# Altium PCB PCB.PcbDoc (part 1 of 7)
Units mm, origin at the board's own origin, x right, y up, seen from the top; angles counter-clockwise.
Board outline 78.8 x 69 mm, 12 copper layers (Top Layer, GND_12, uStrip1, GND_35, Clocks, GND_57, POWER, Slow_Ctrl, GND_810, uStrip2, GND_1012, Bottom Layer), stack 2.926 mm thick; 290 components, 212 nets, 1379 pads, 3418 vias.
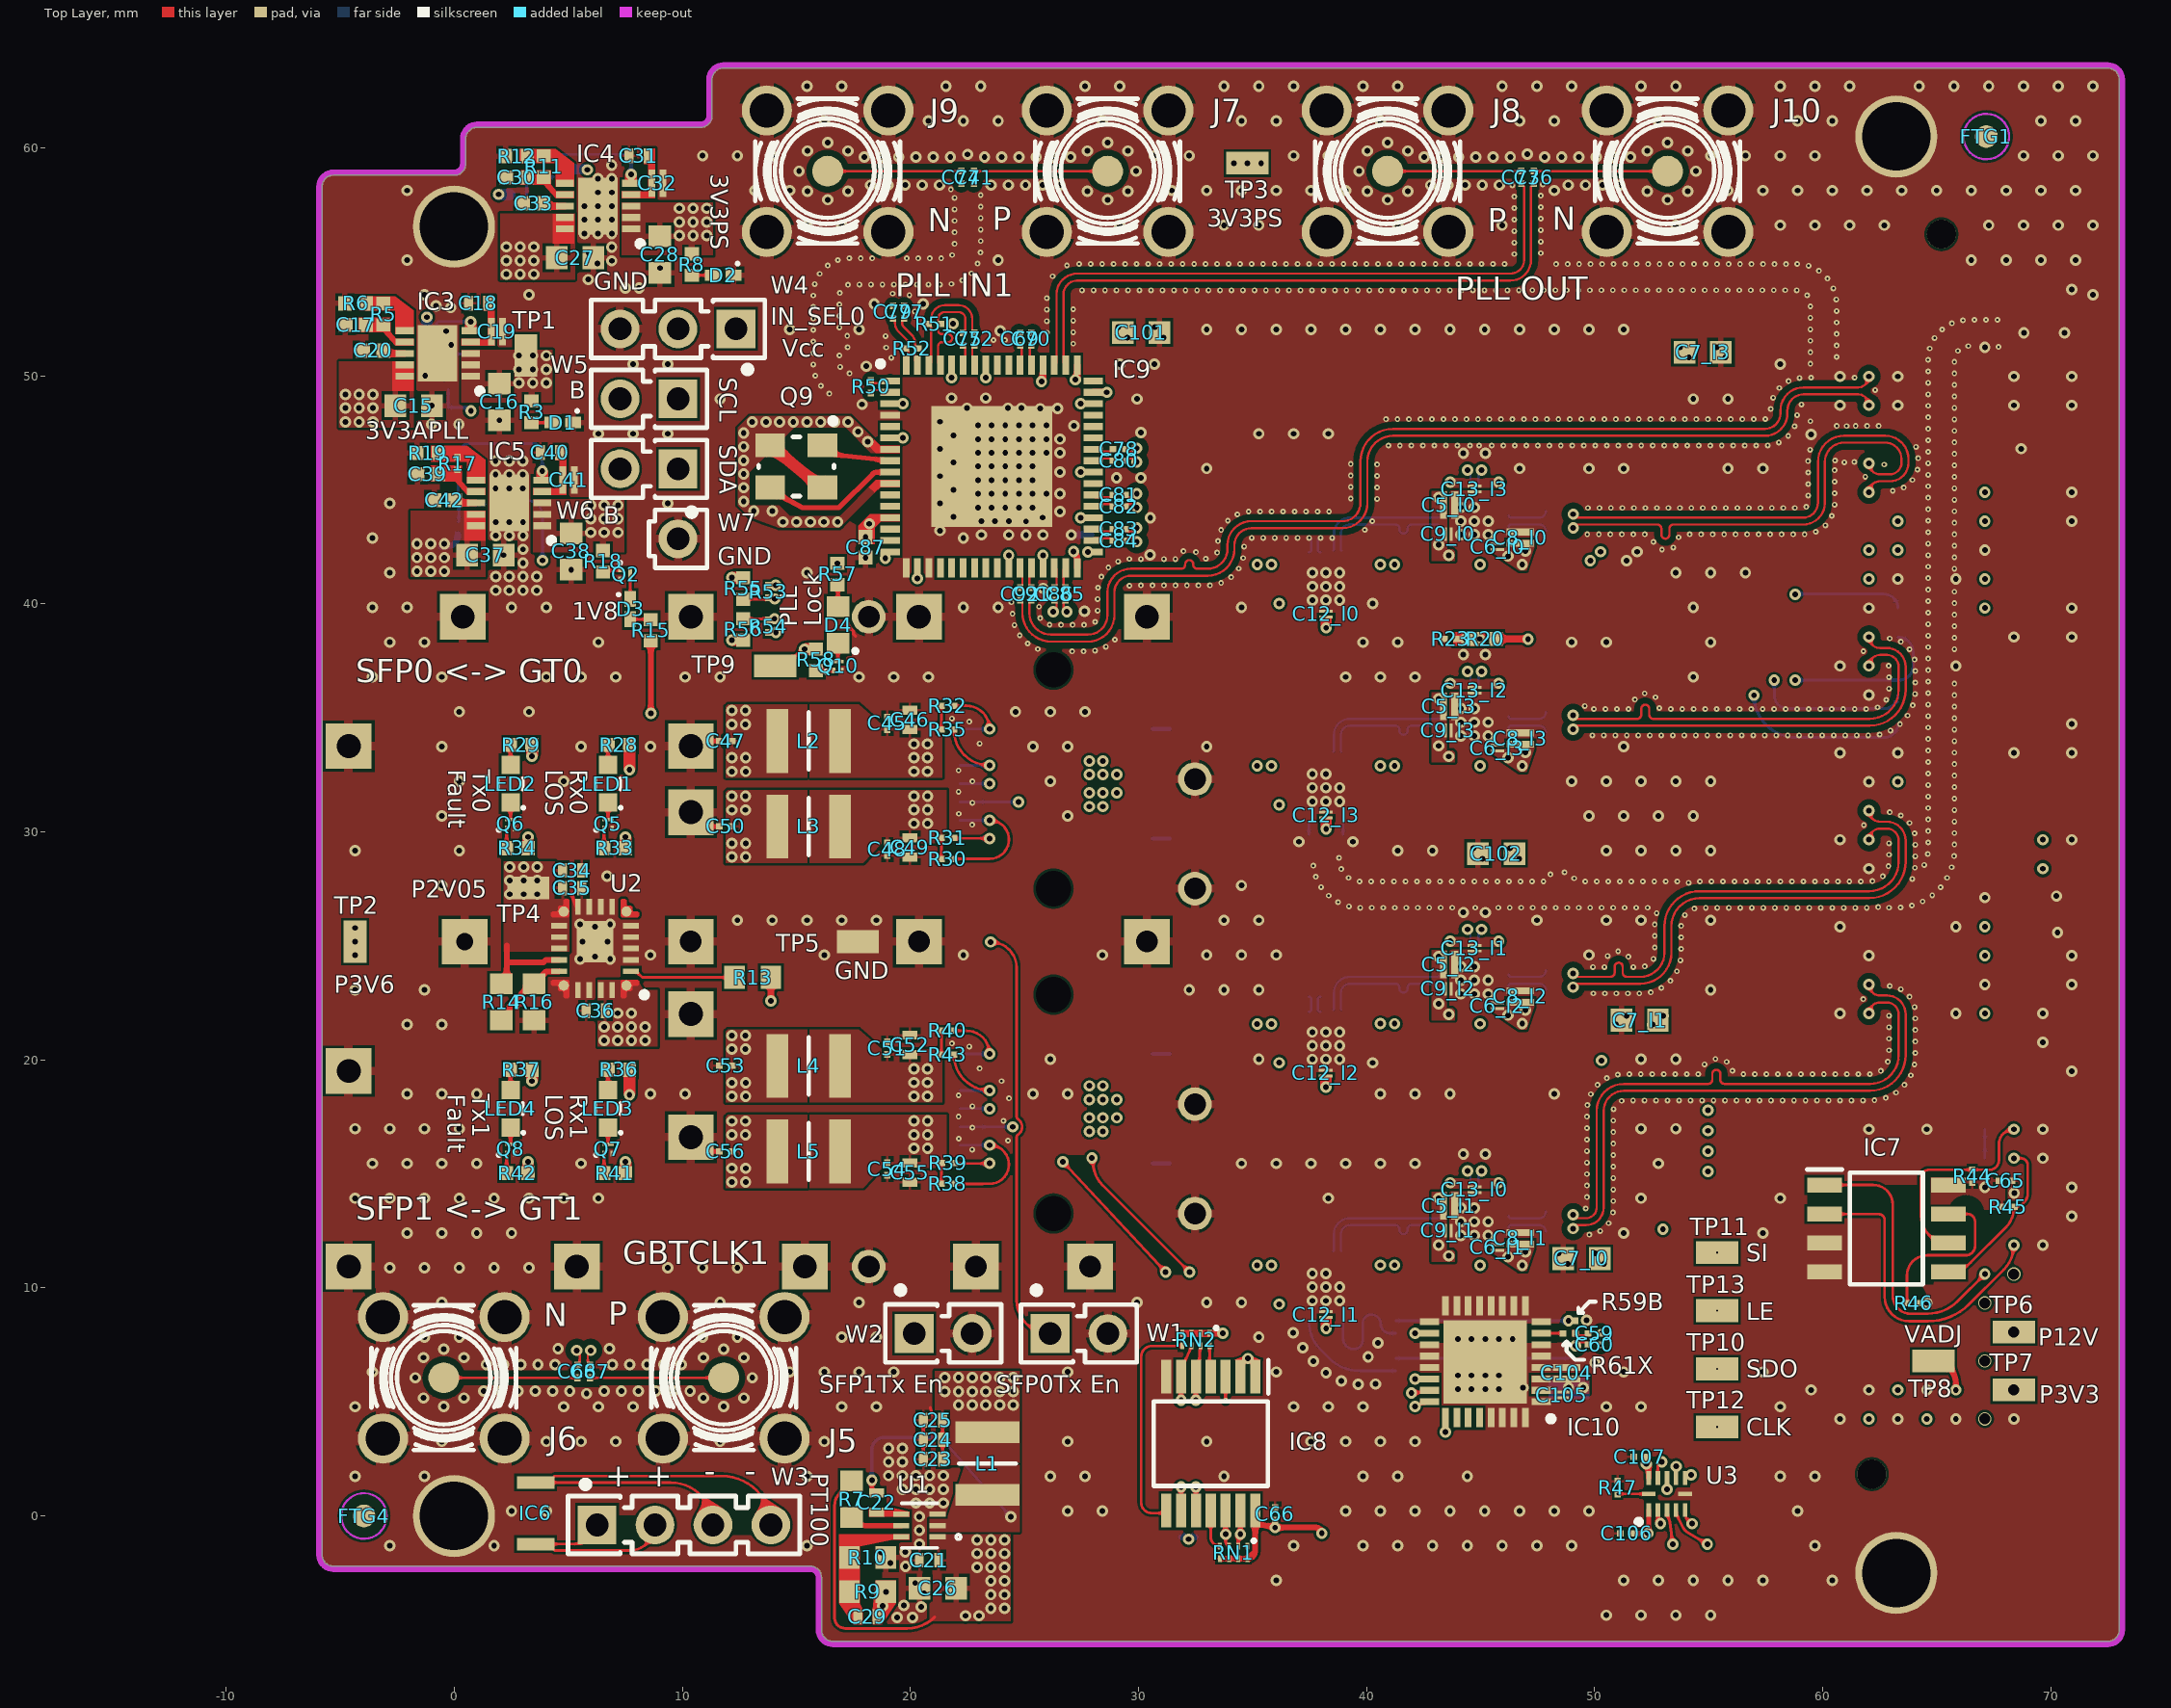
[diagram p0: Top Layer view]
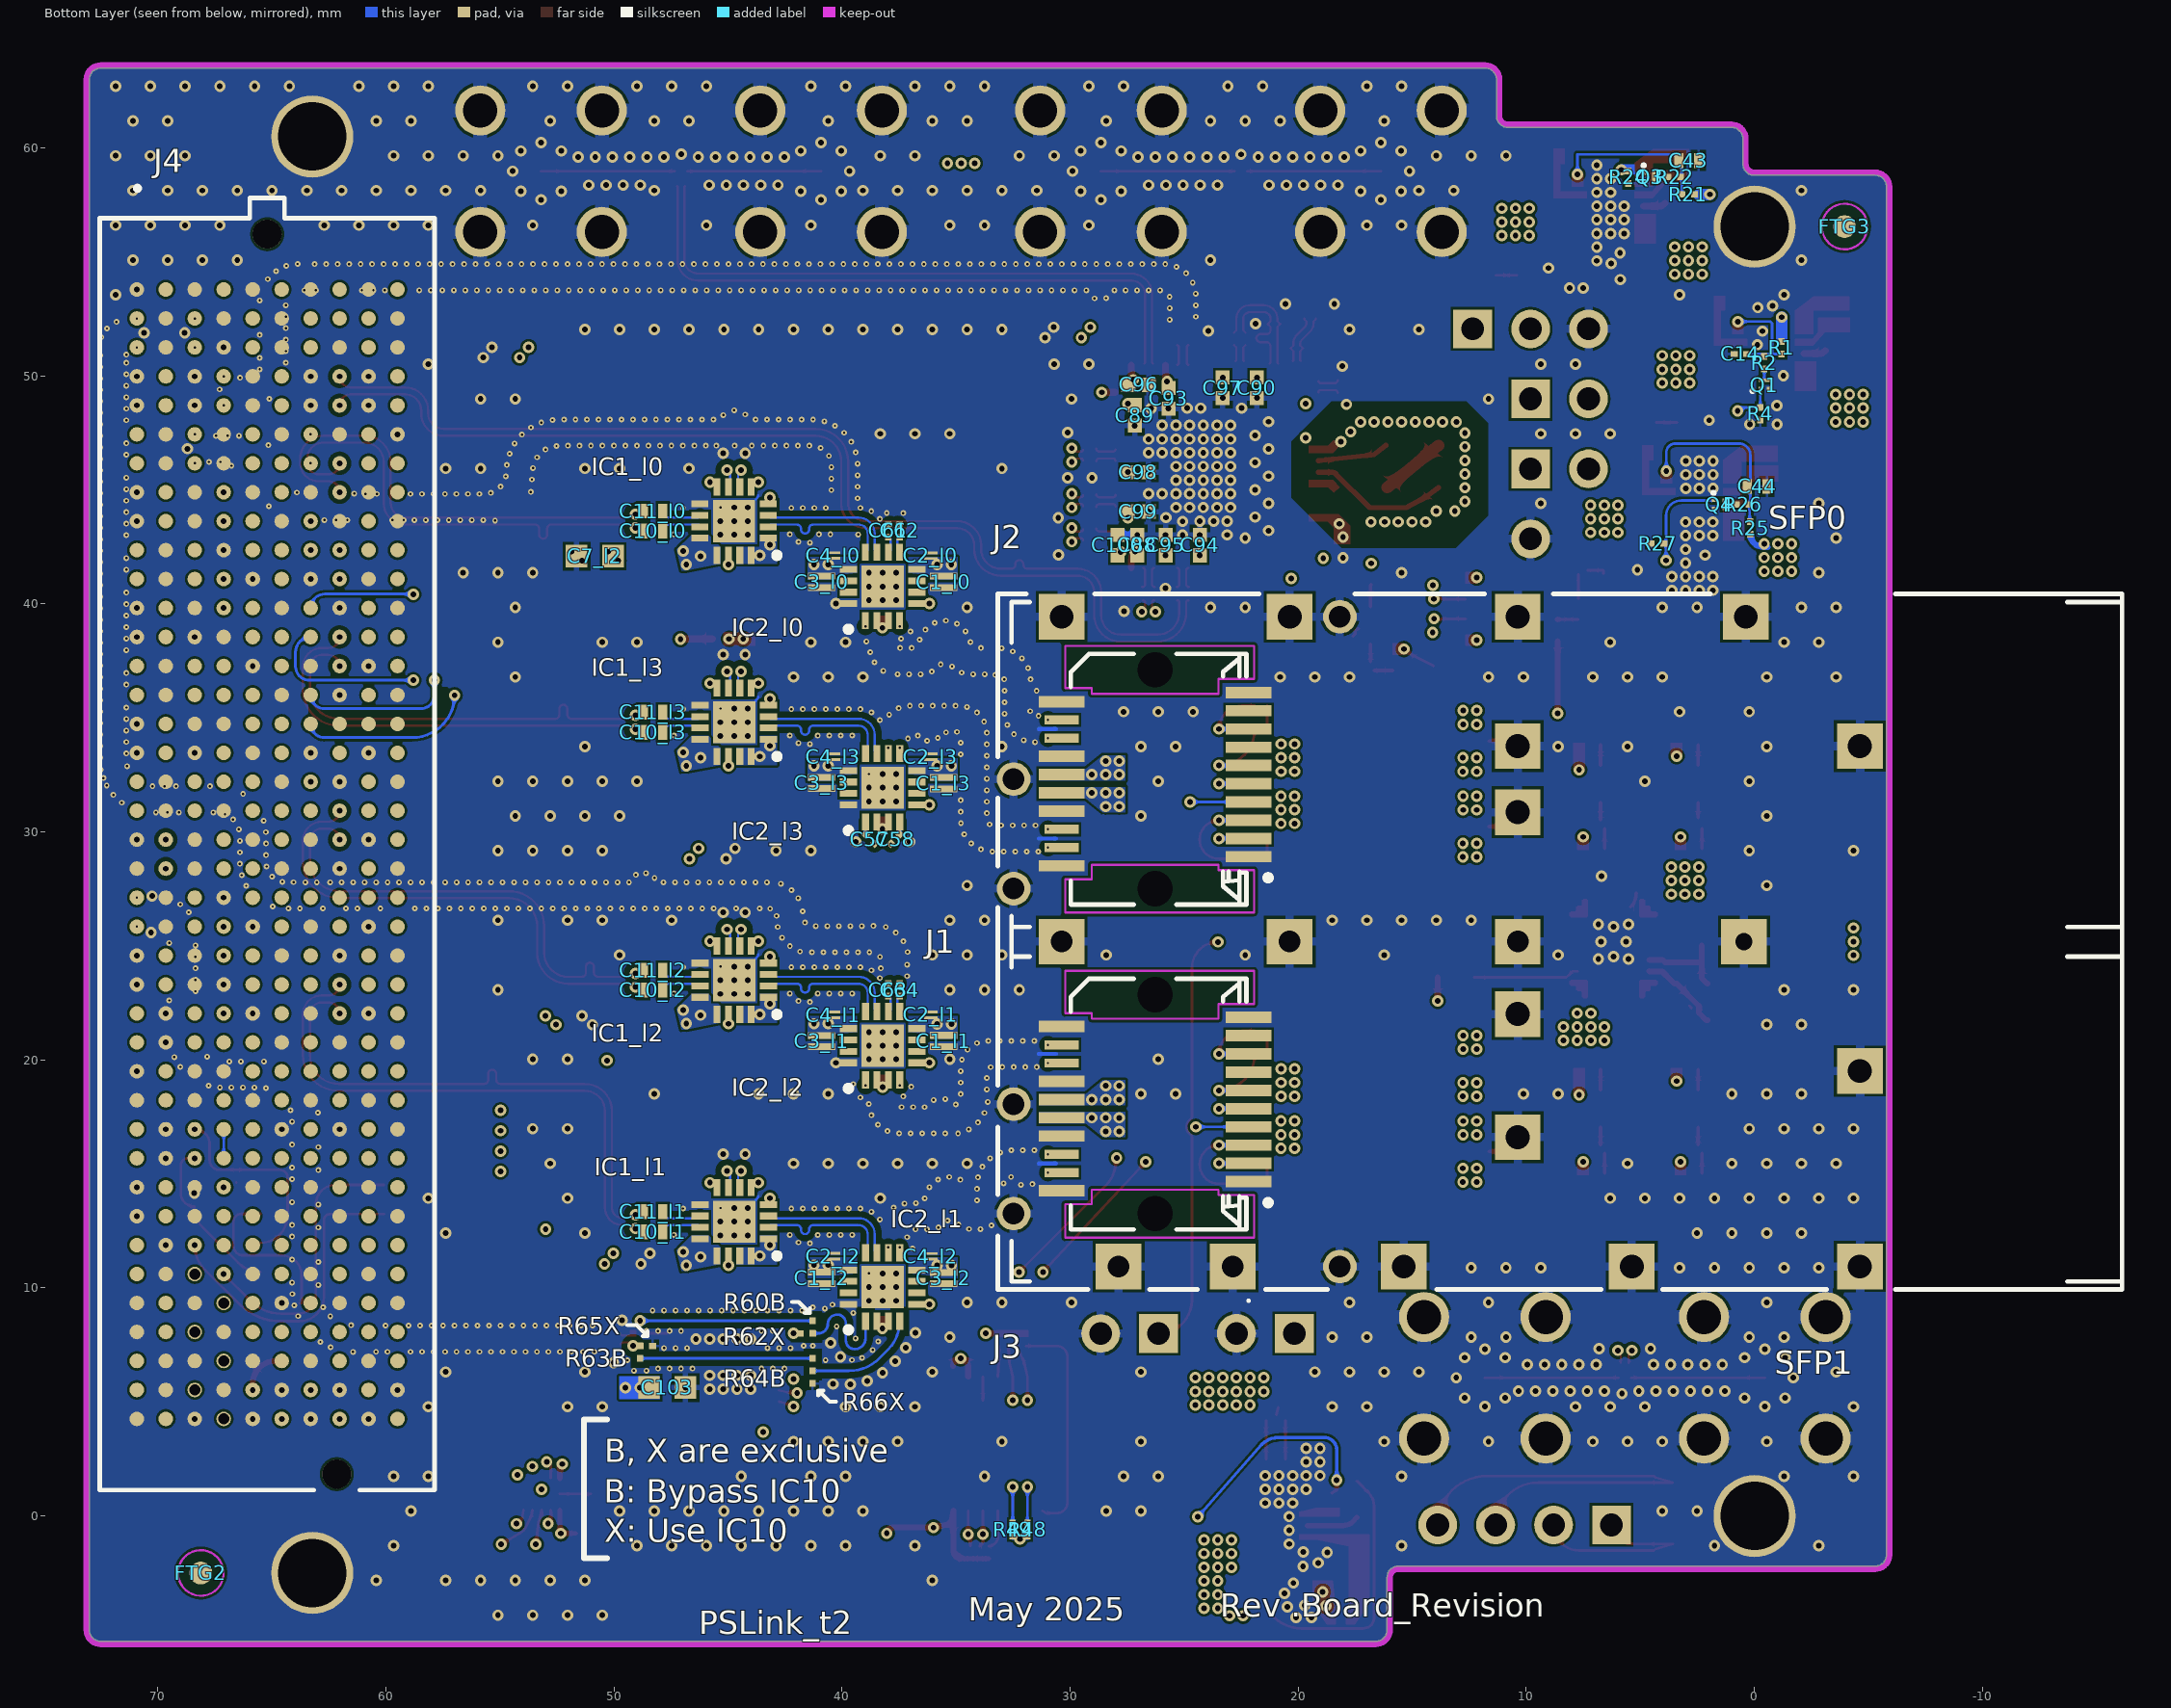
[diagram p1: Bottom Layer view, seen from below]
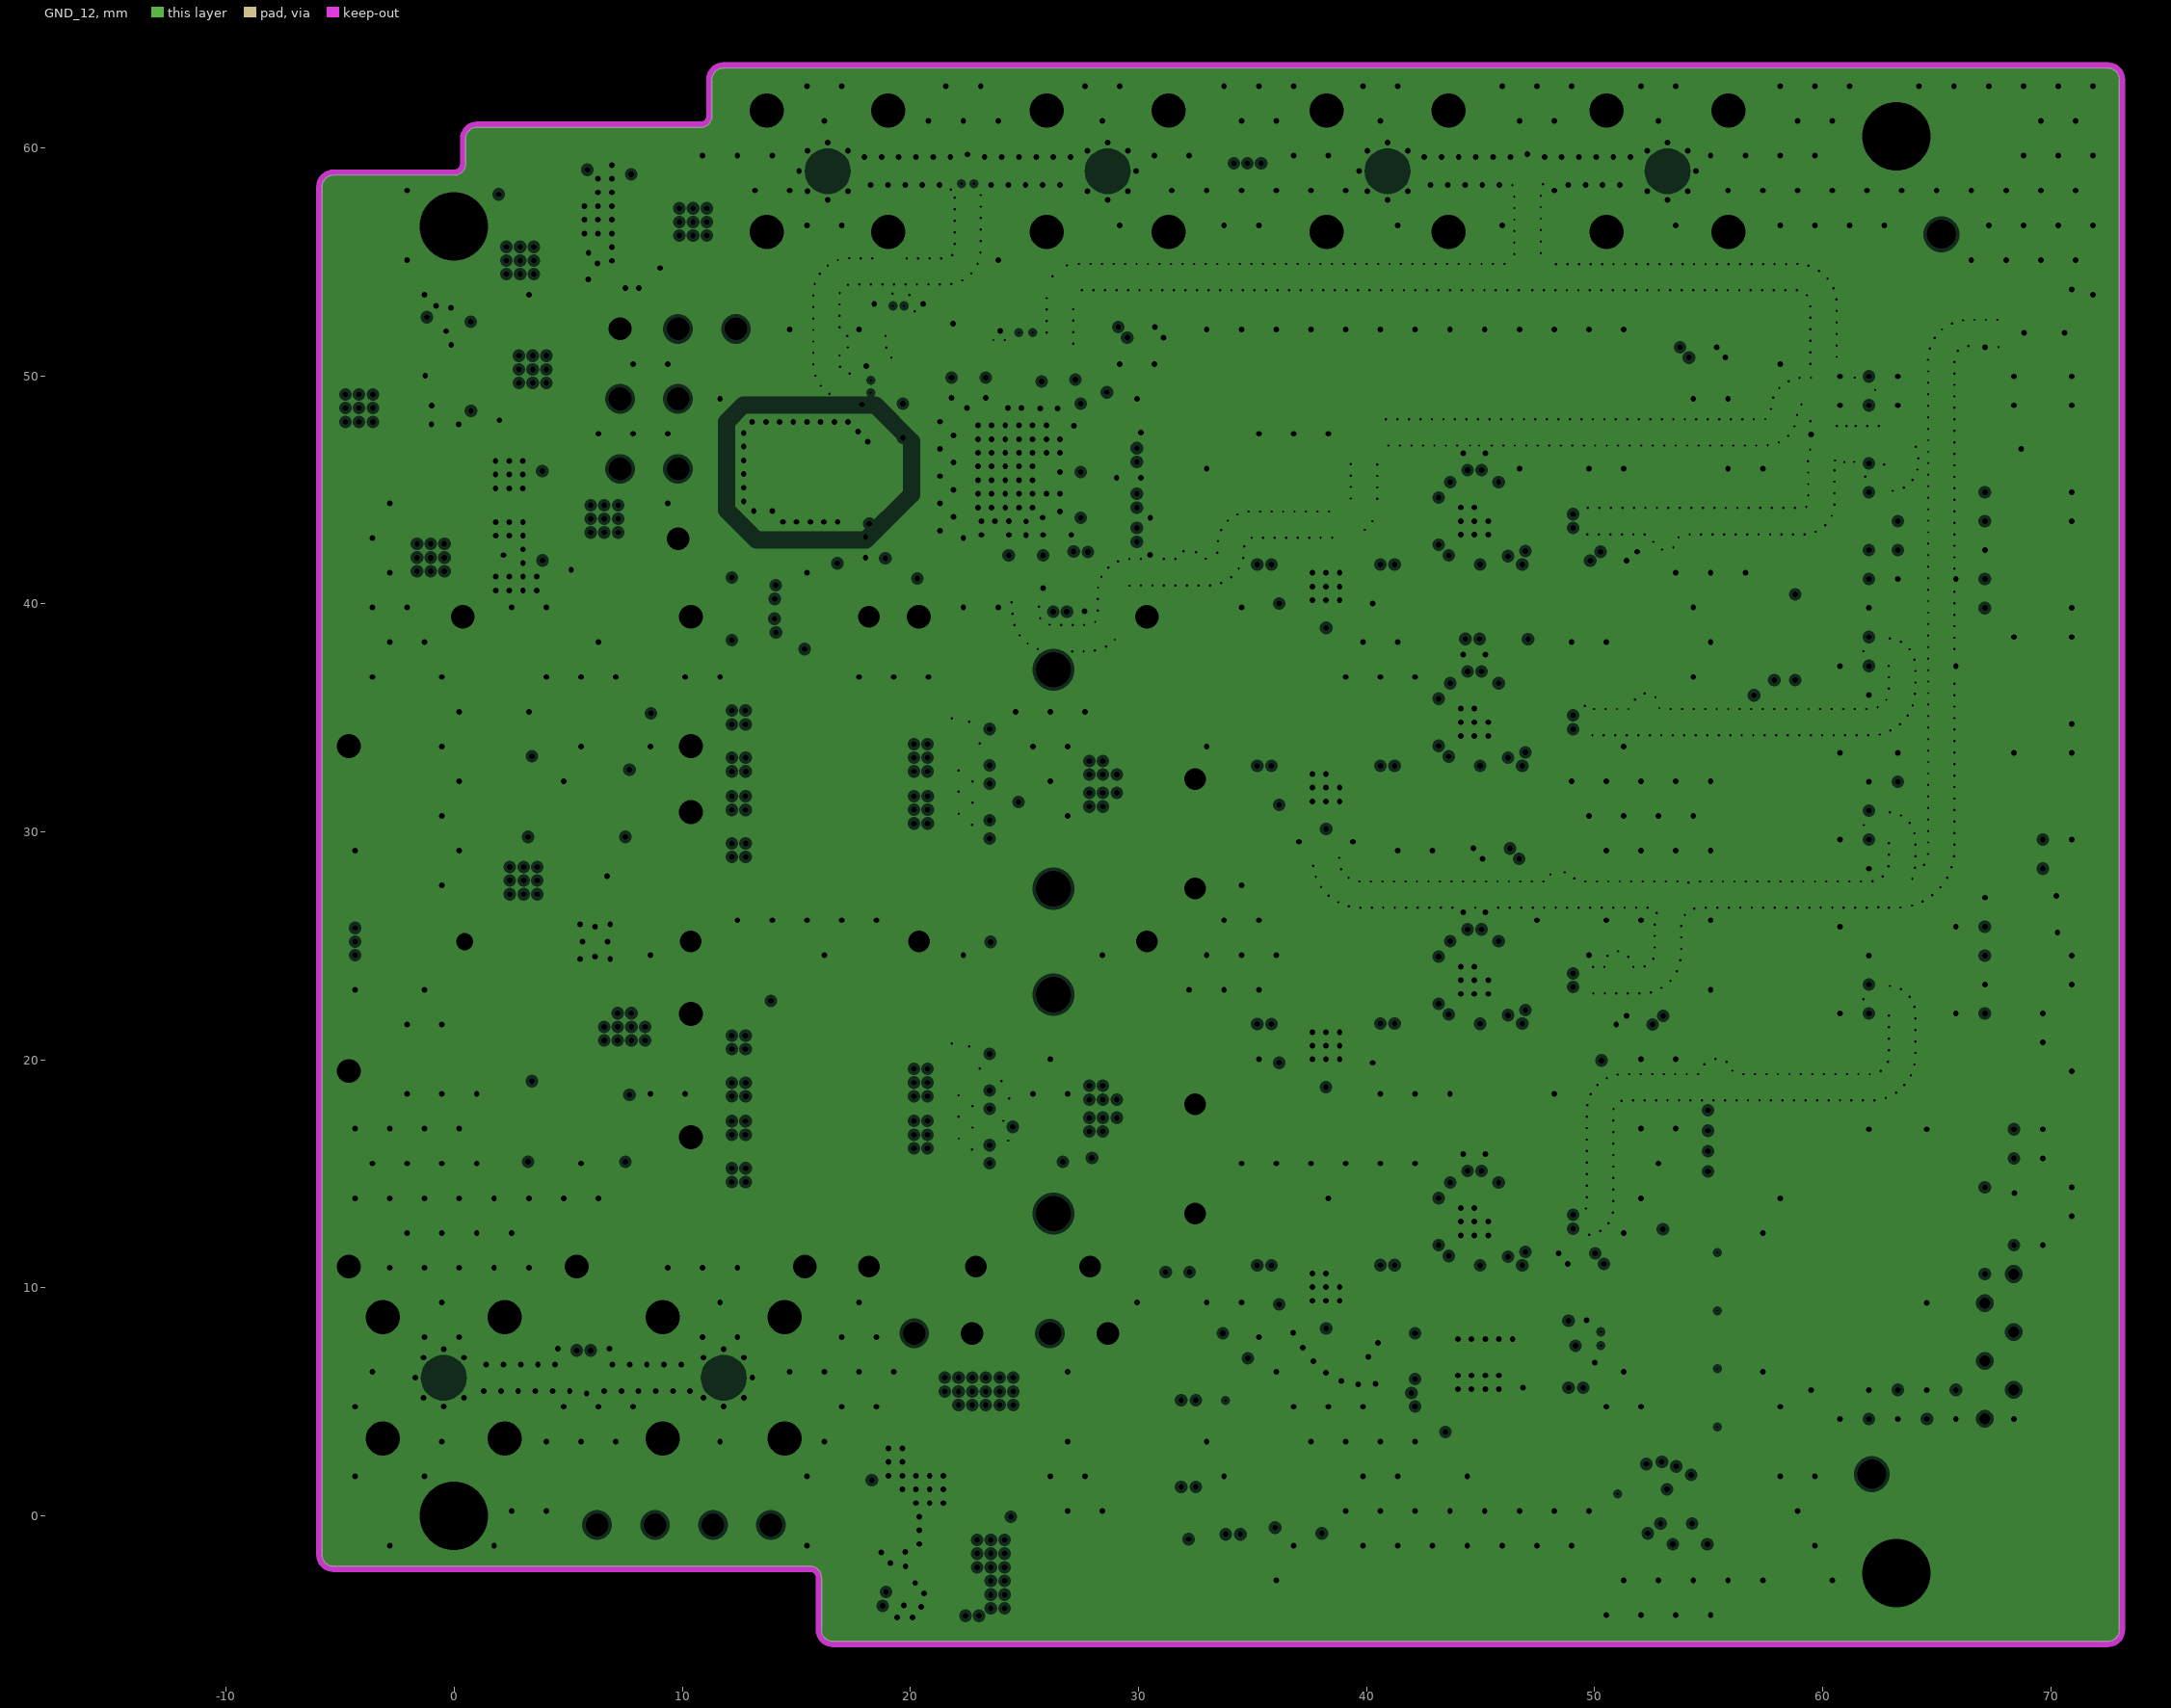
[diagram p2: GND_12, clearances drawn from the general rule]
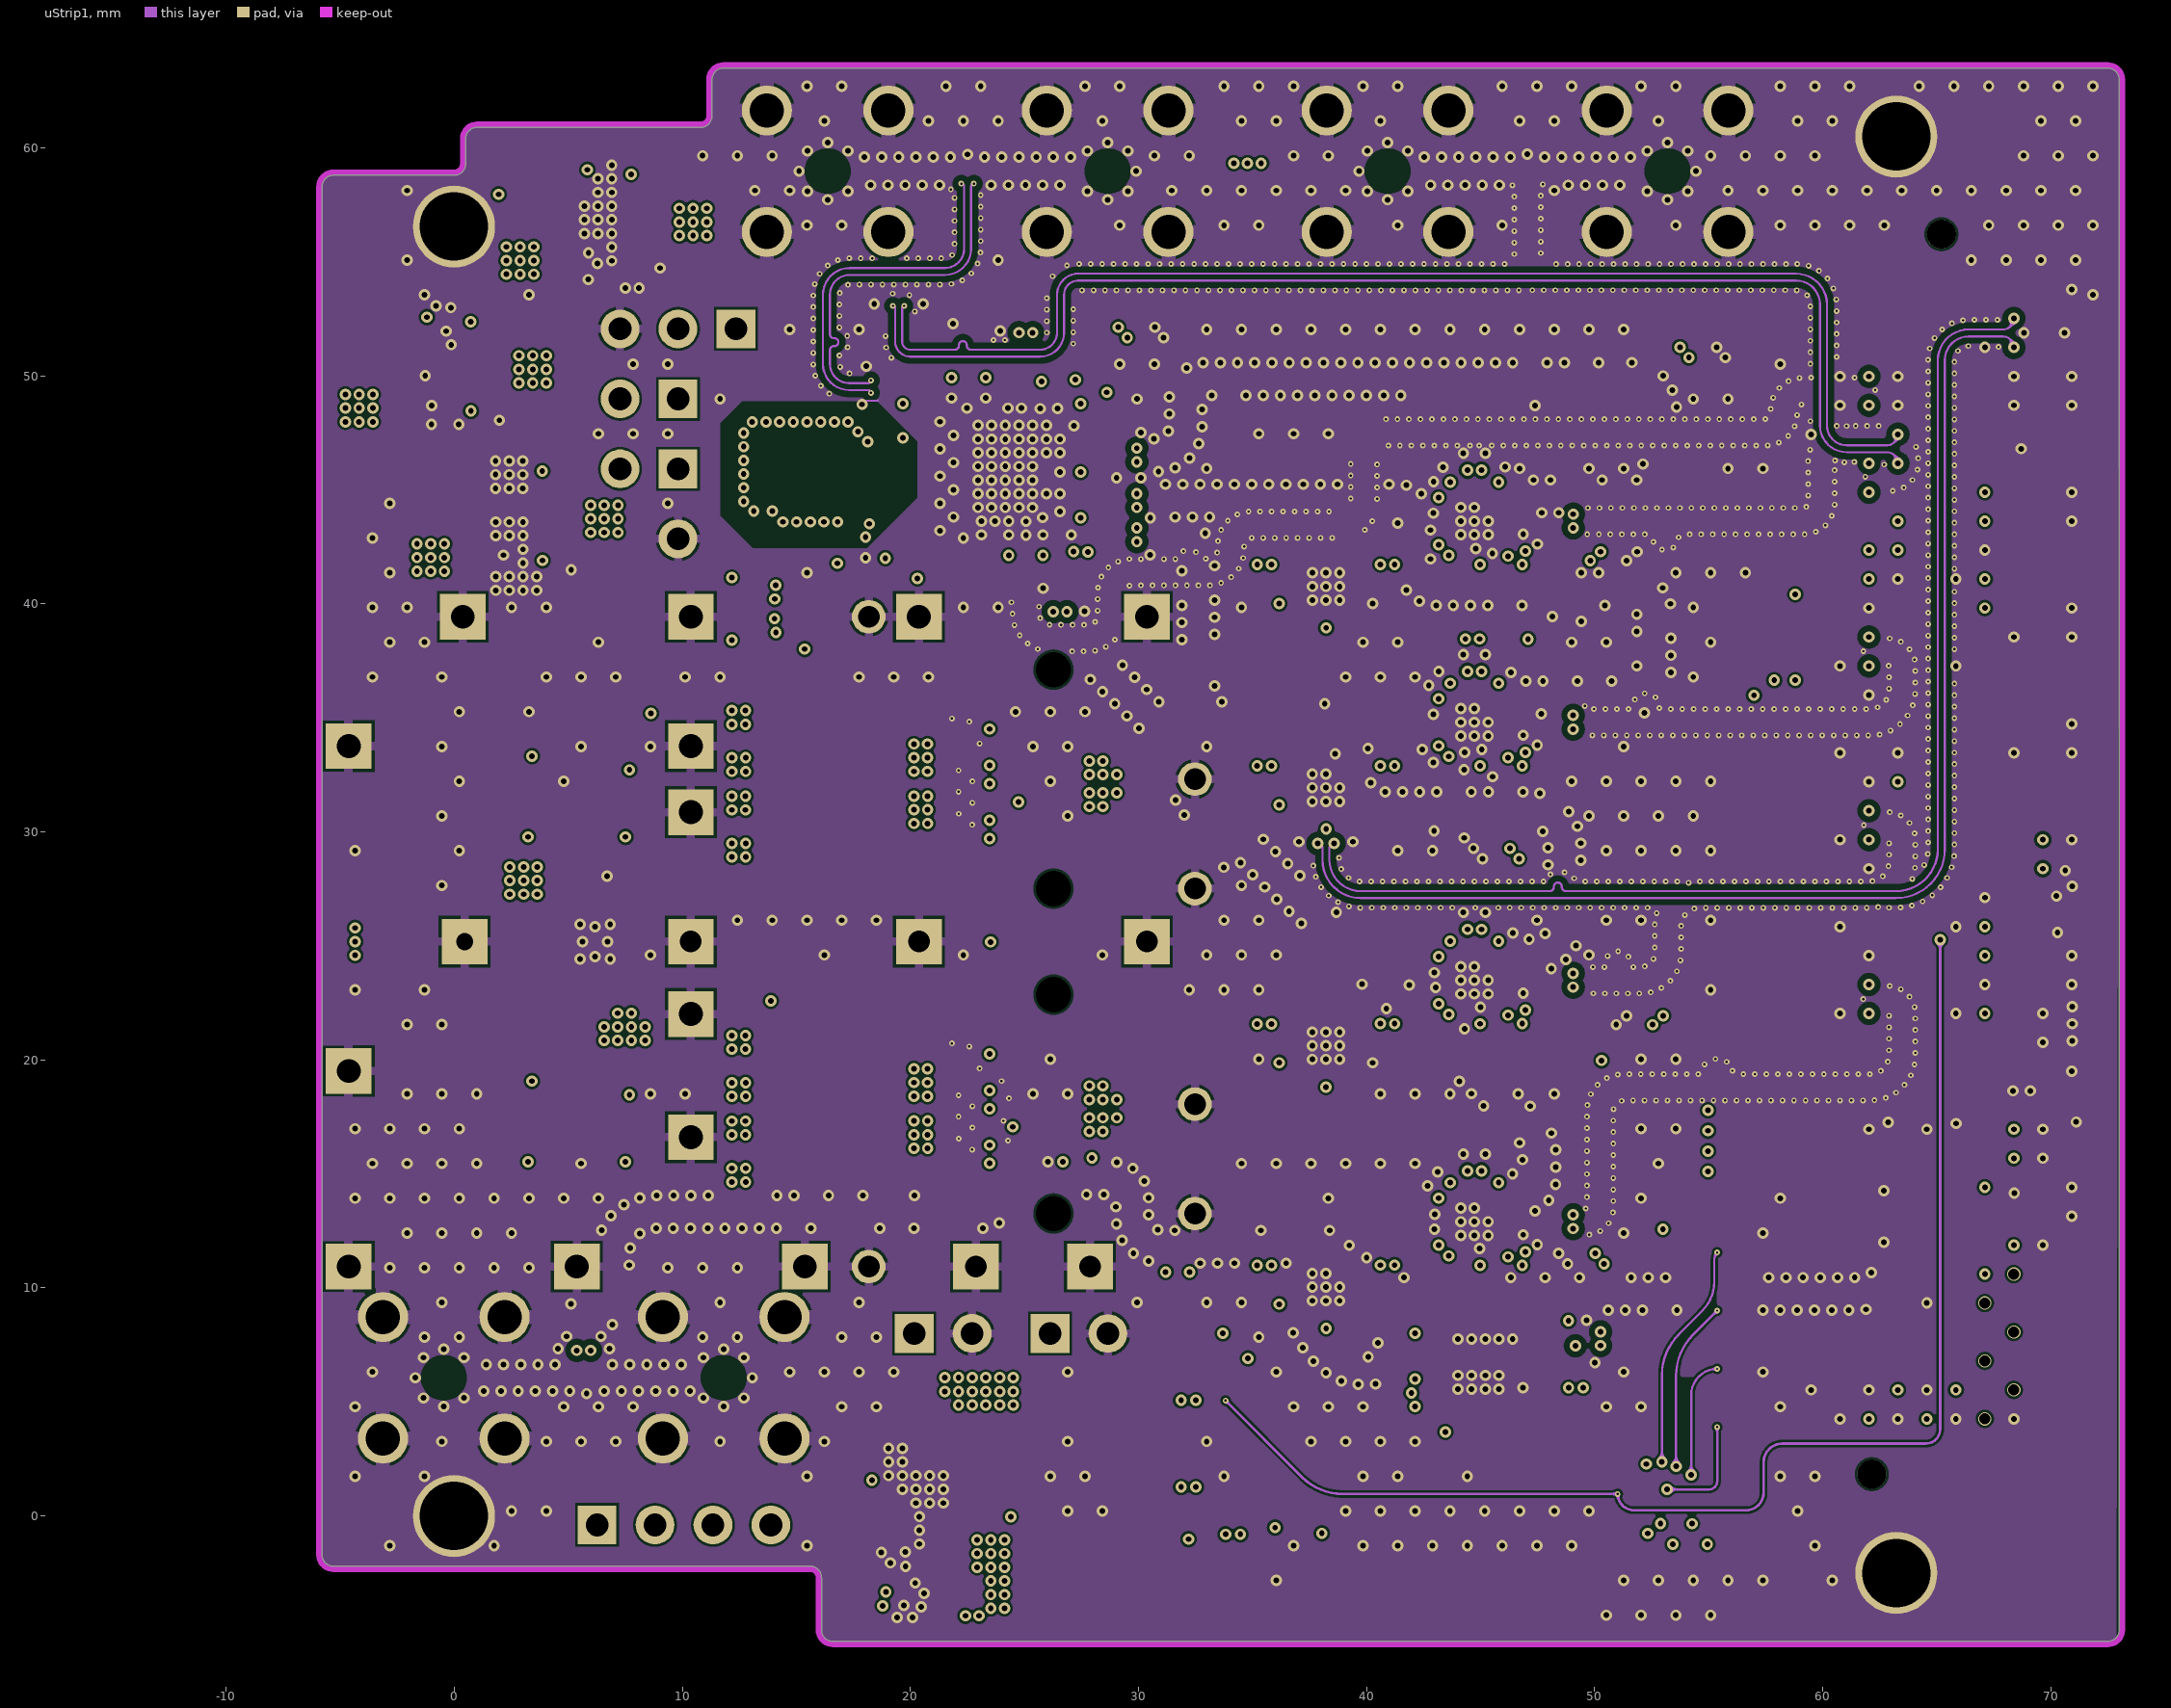
[diagram p3: uStrip1]
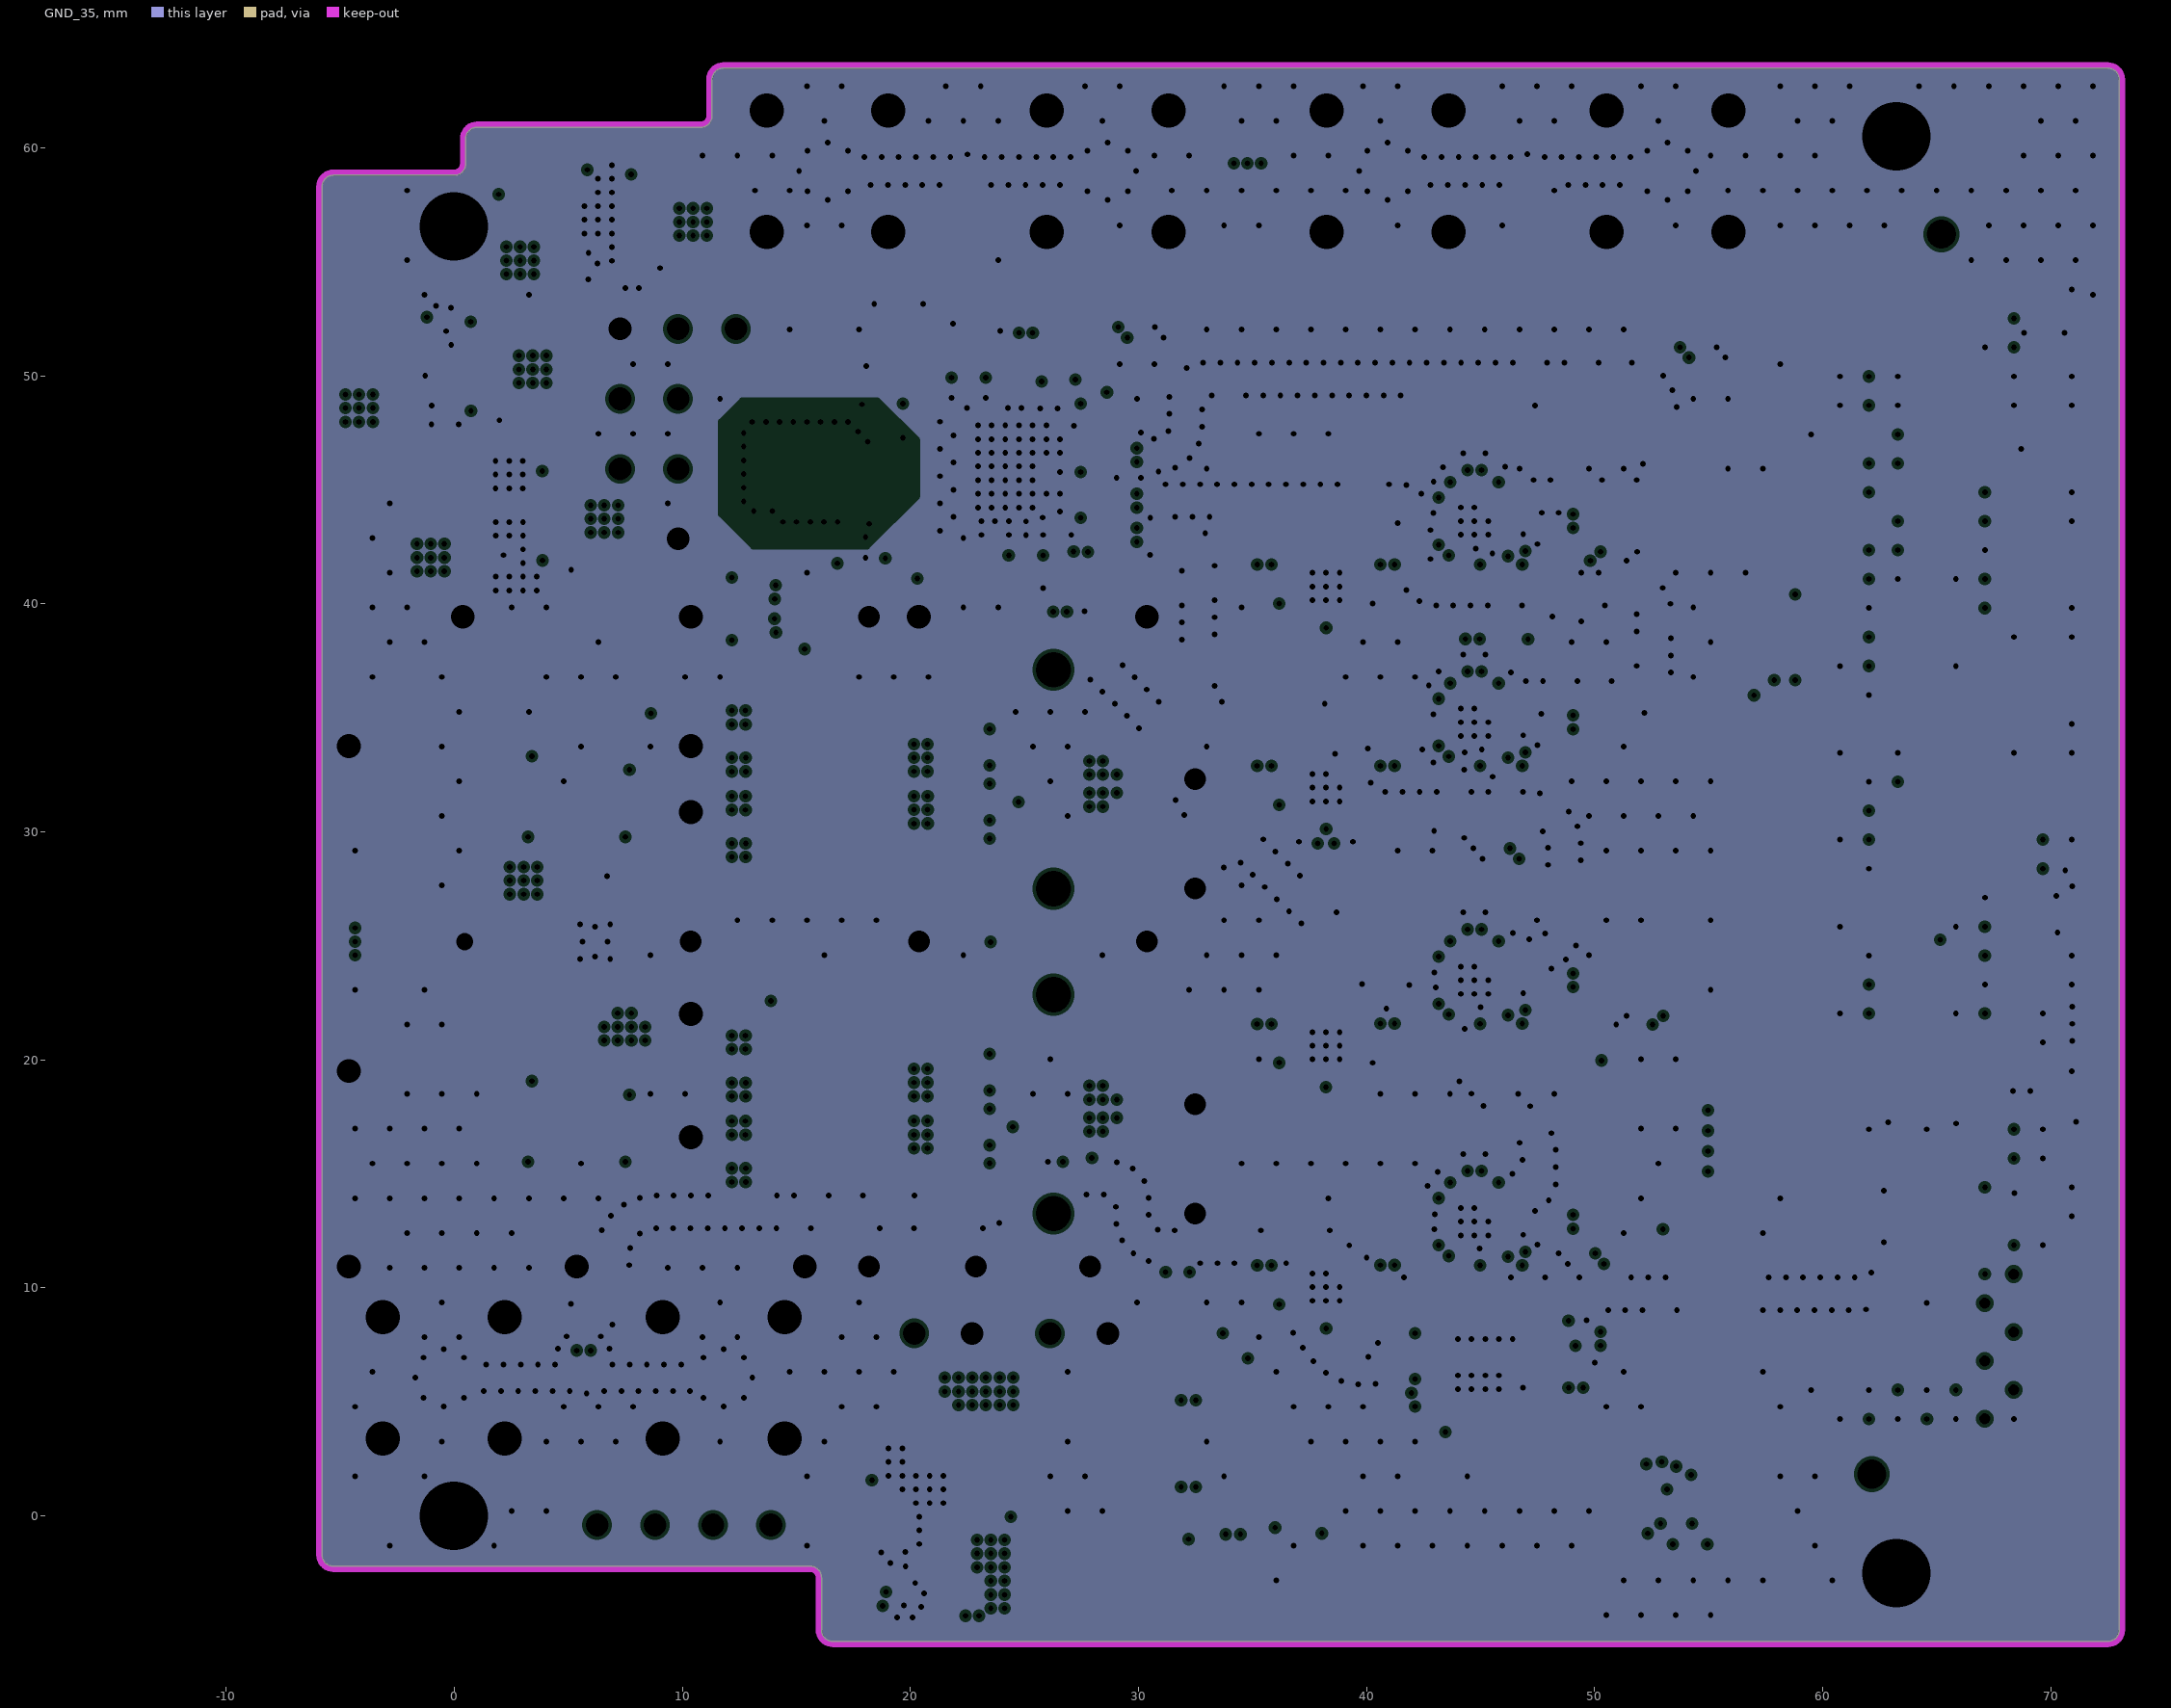
[diagram p4: GND_35, clearances drawn from the general rule]
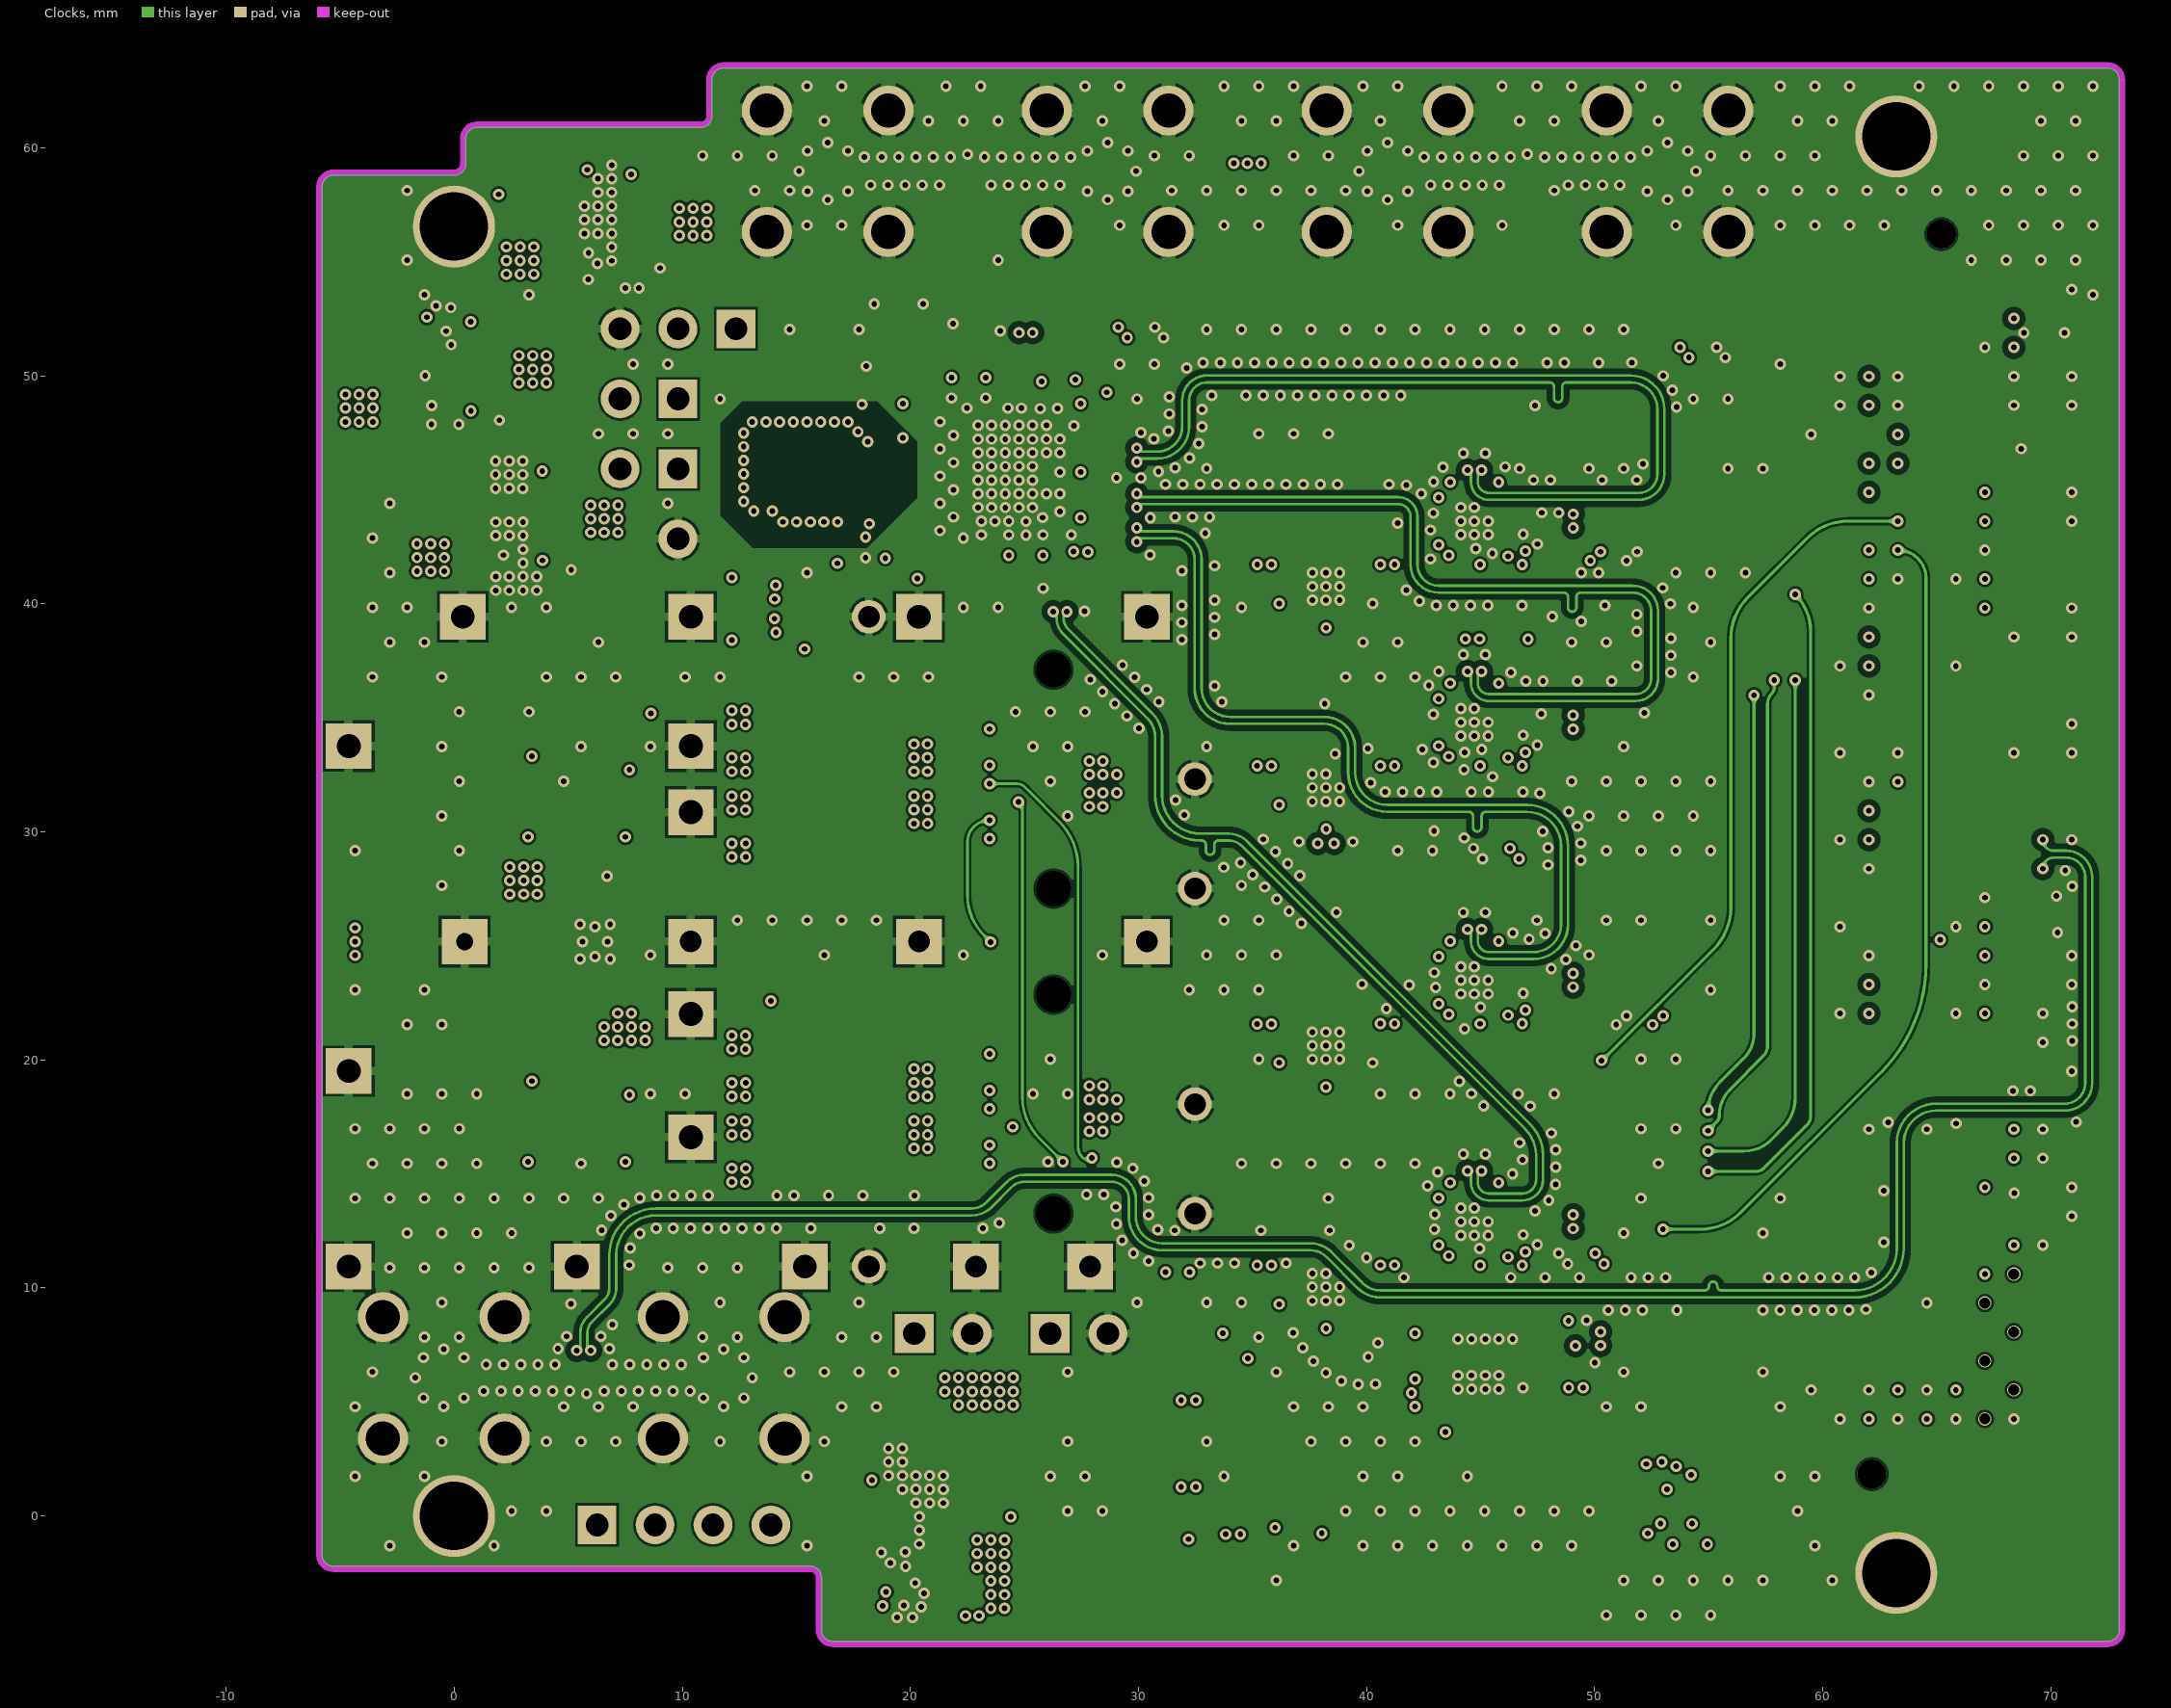
[diagram p5: Clocks]
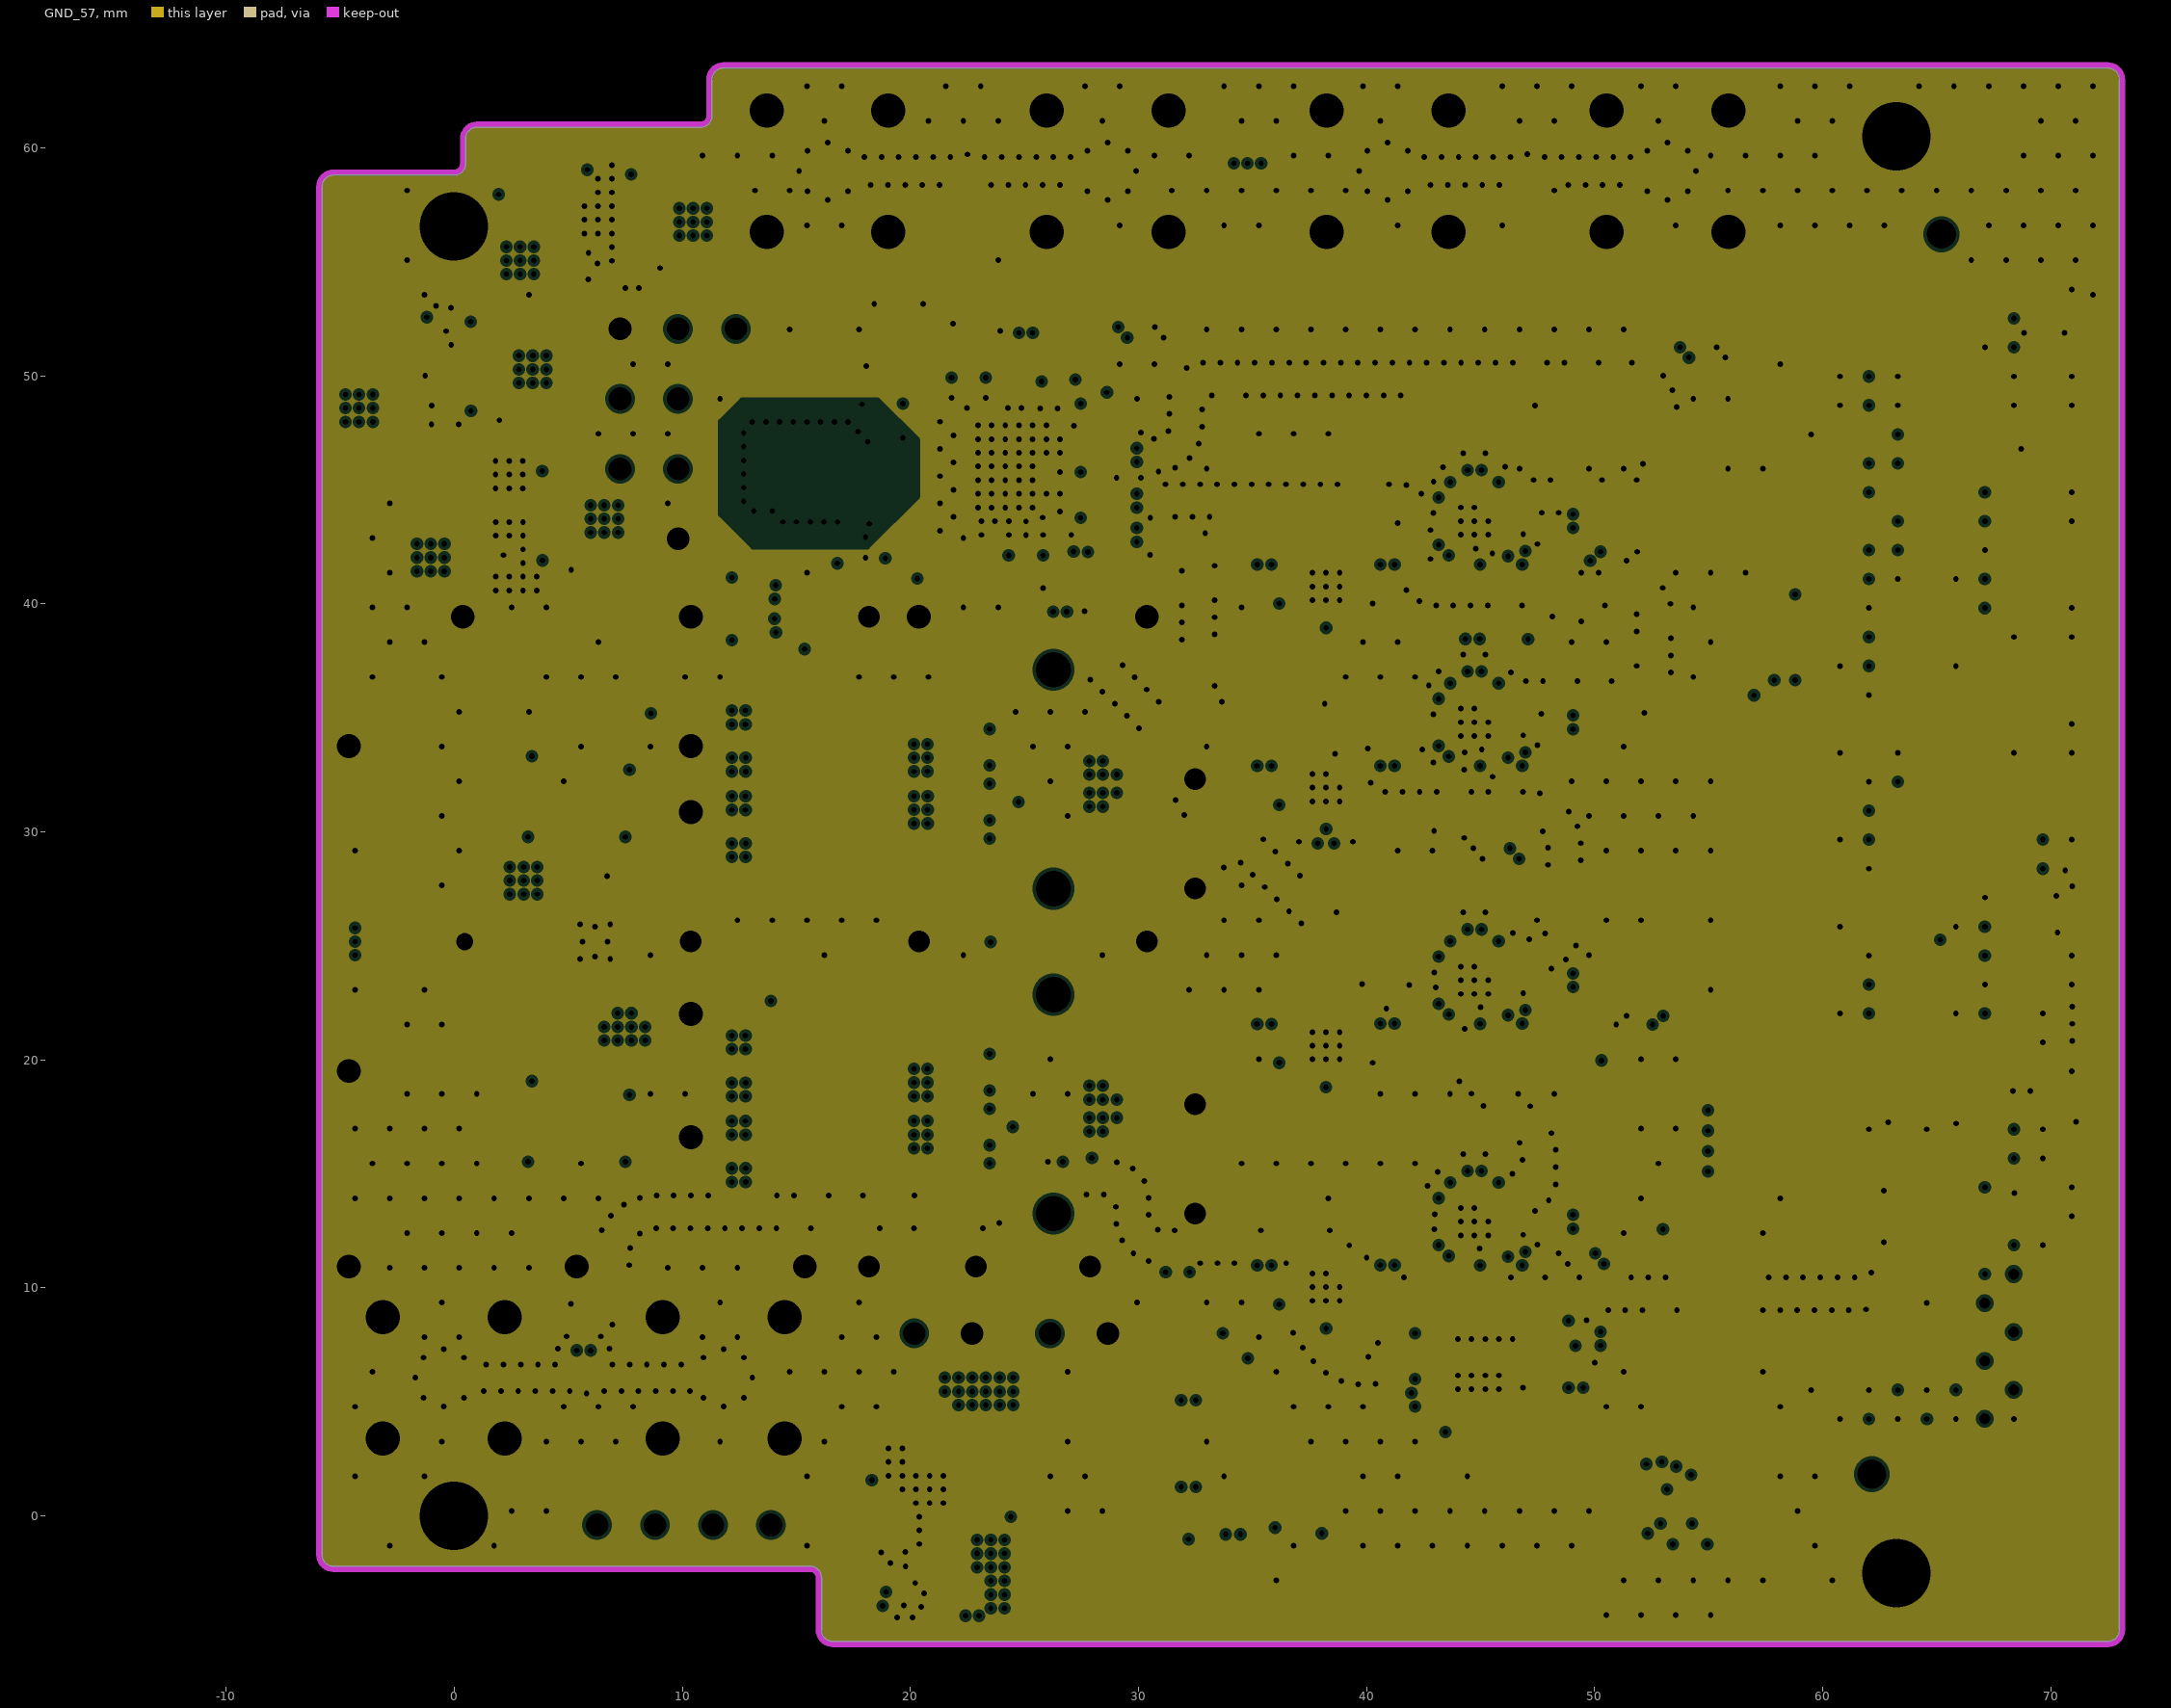
[diagram p6: GND_57, clearances drawn from the general rule]
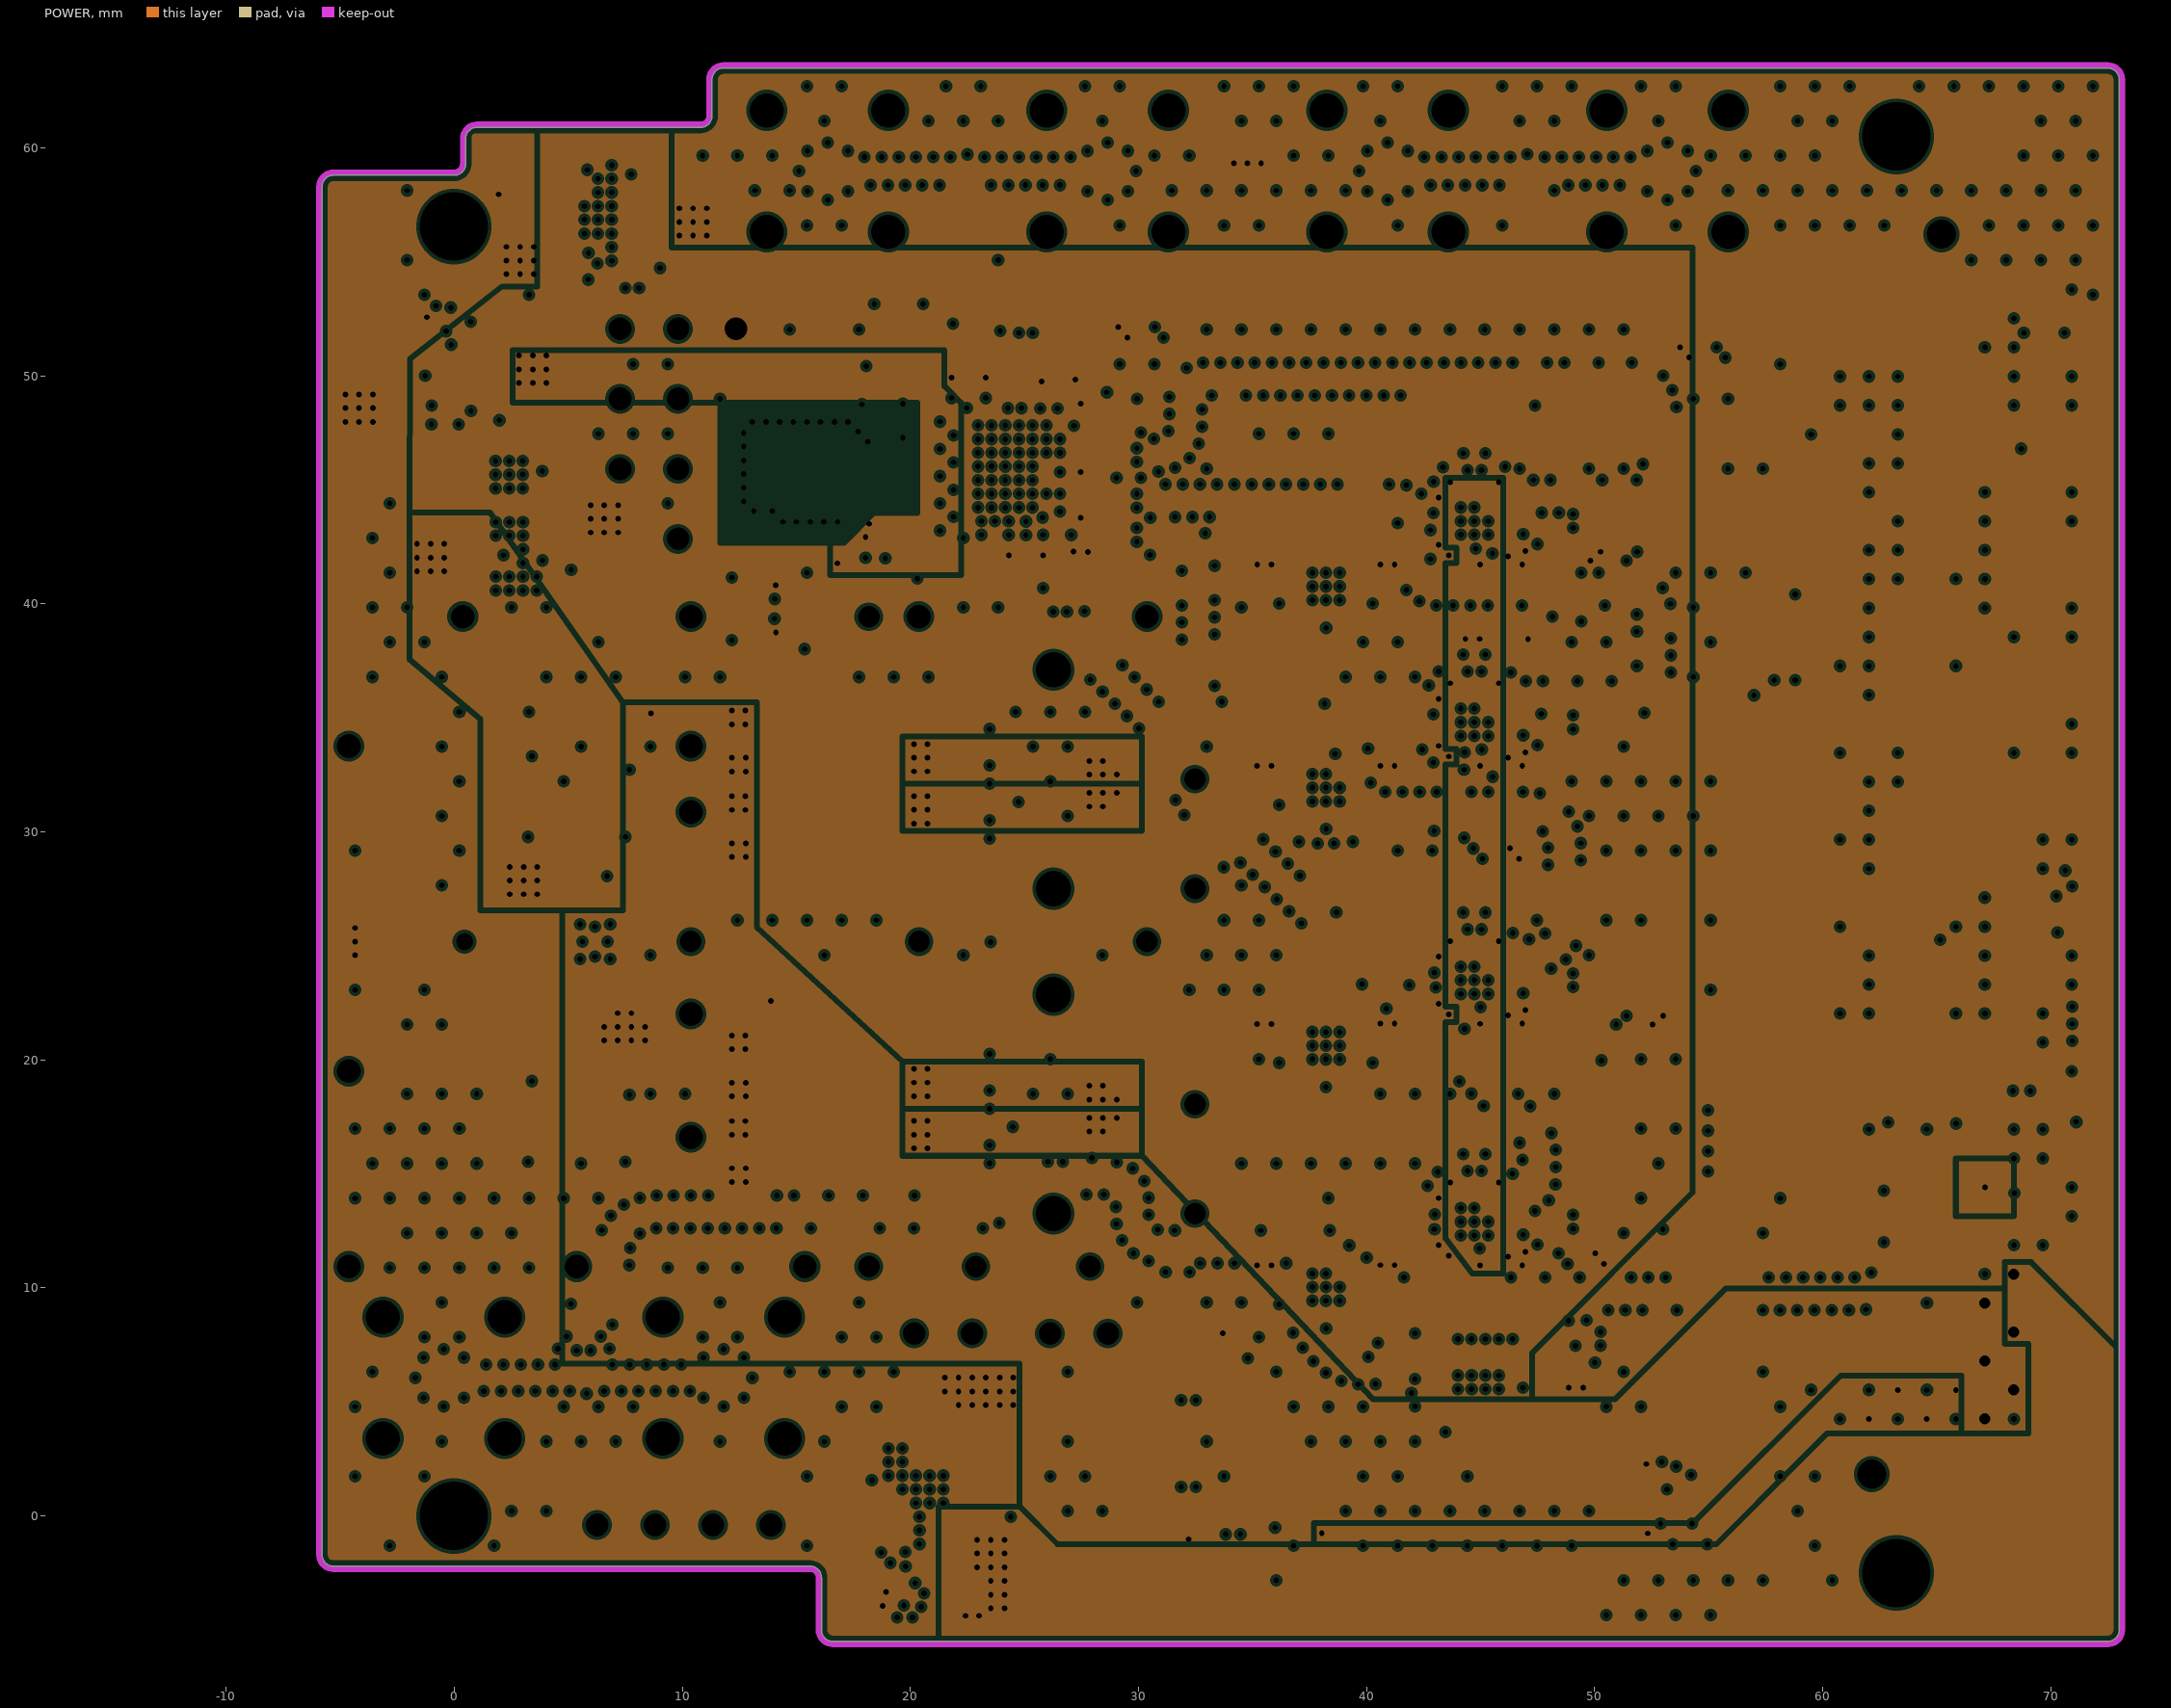
[diagram p7: POWER, clearances drawn from the general rule]
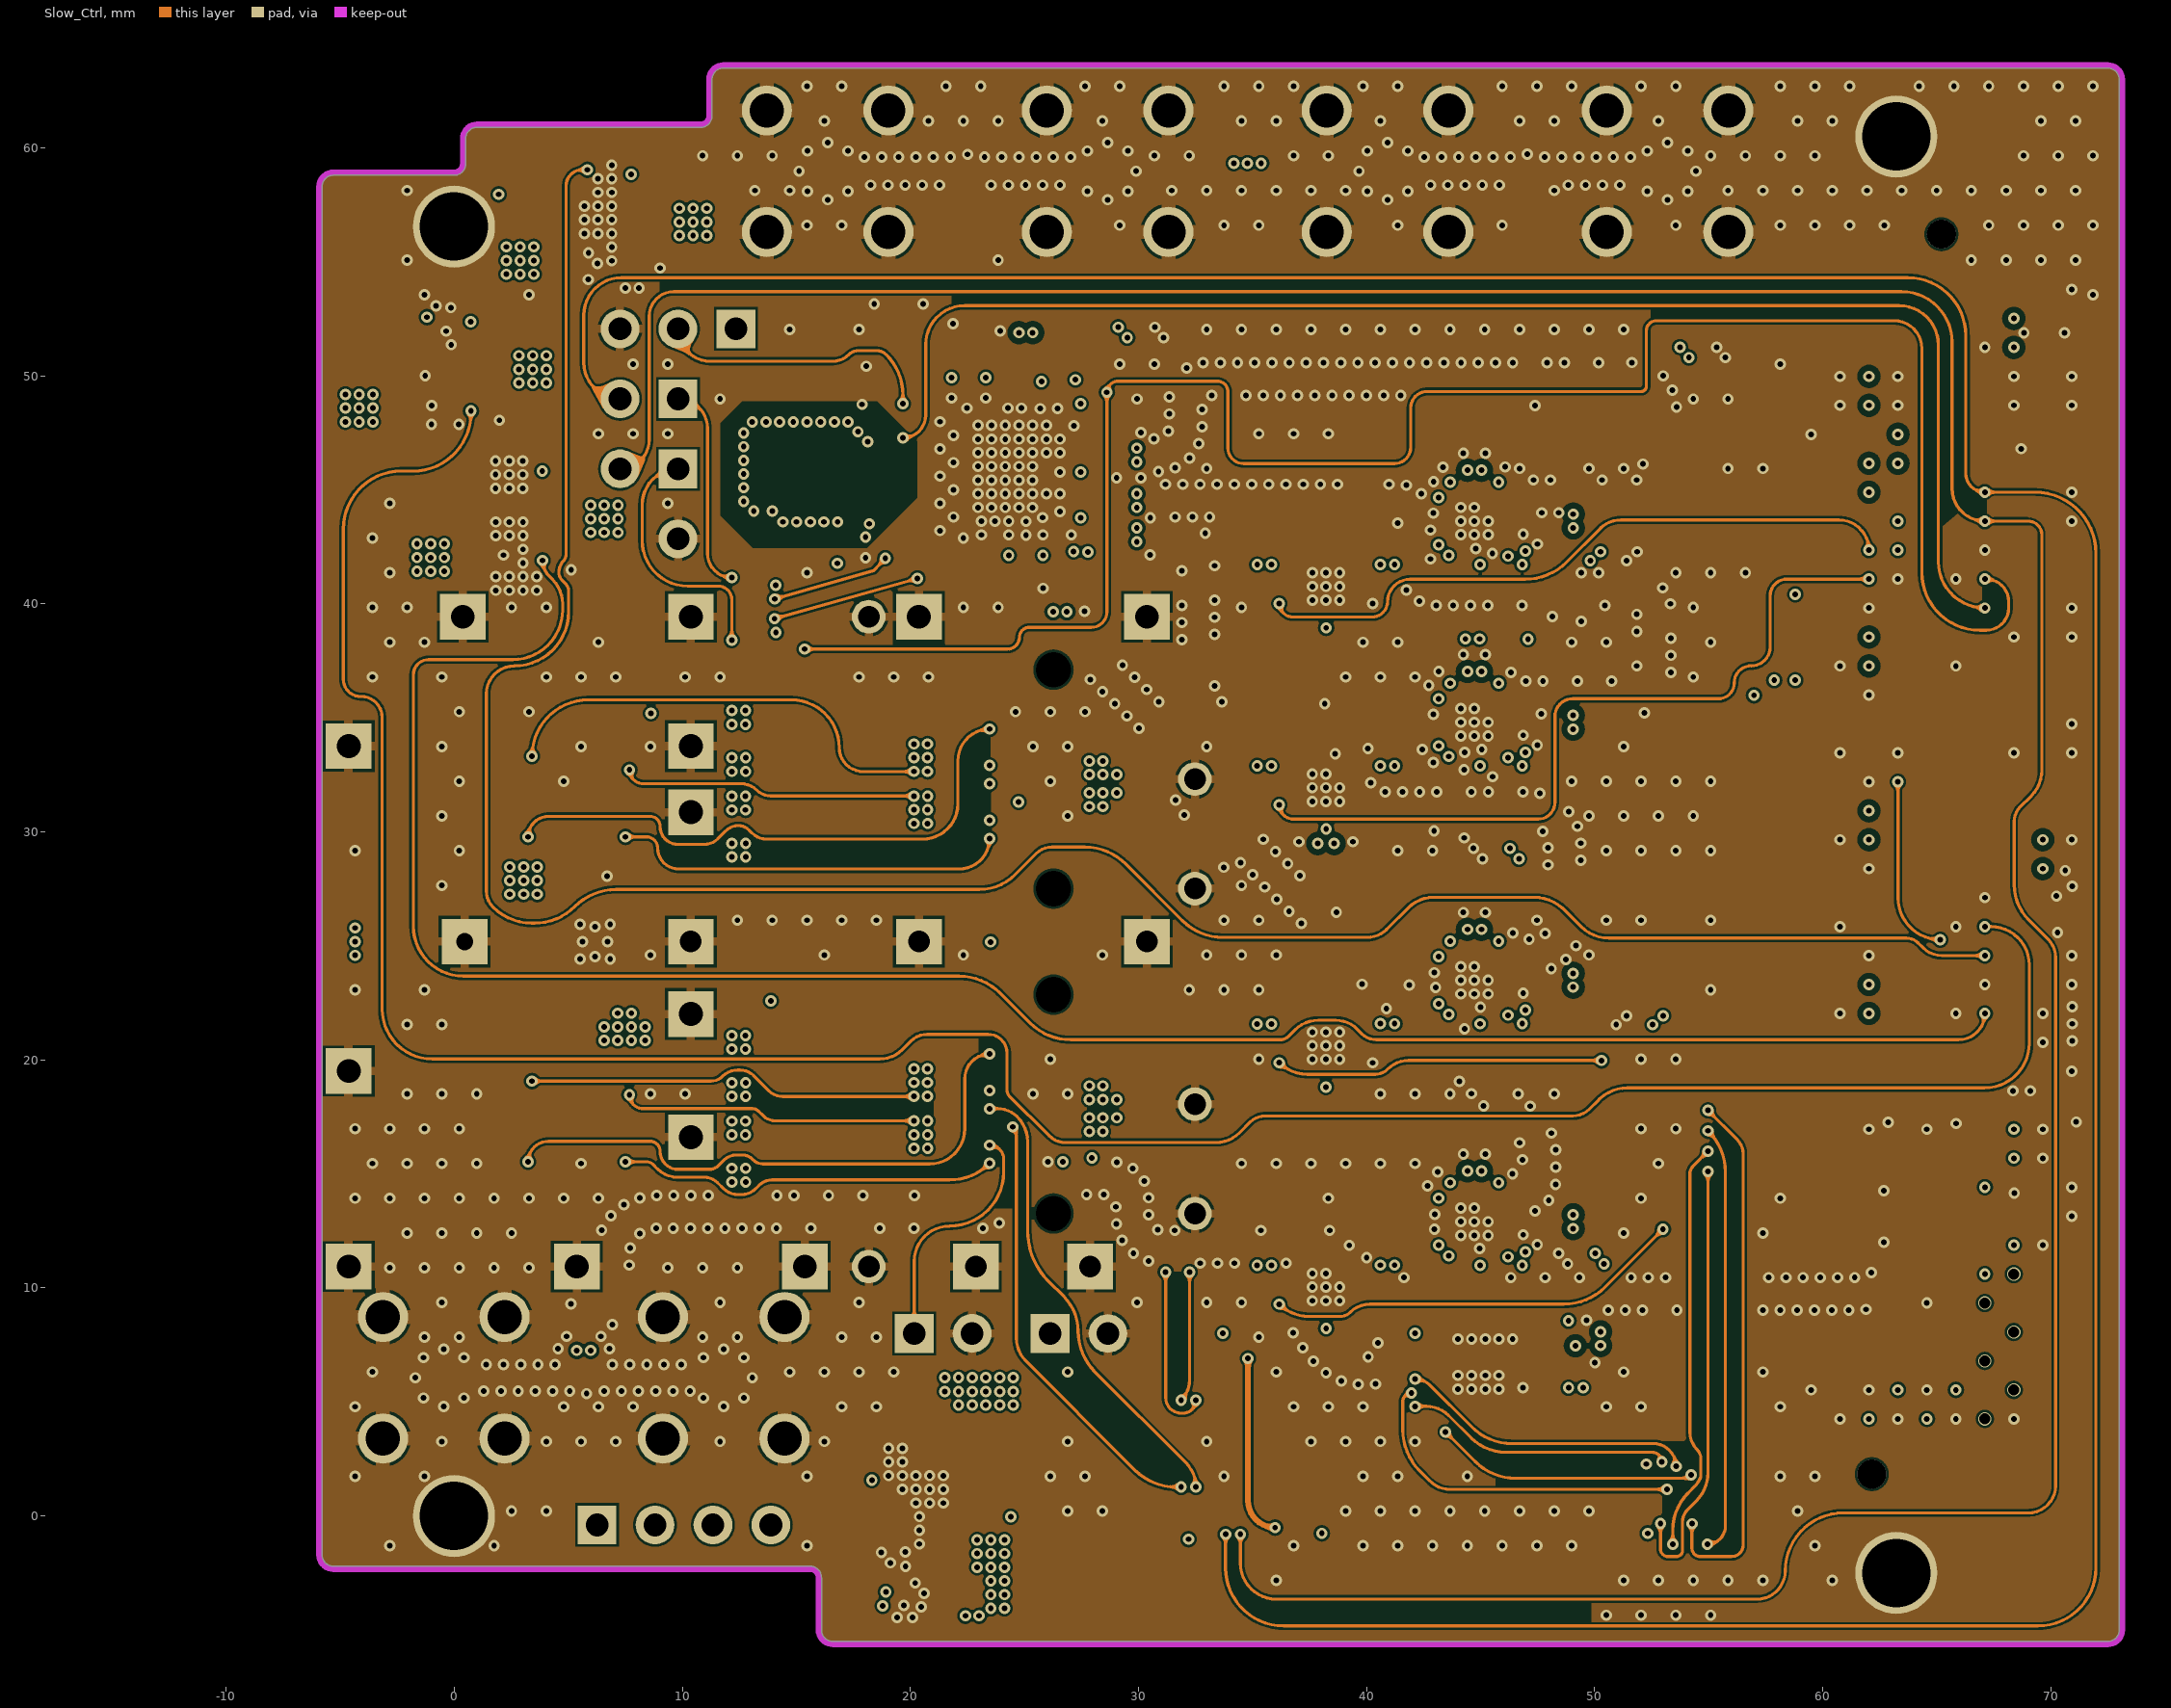
[diagram p8: Slow_Ctrl]
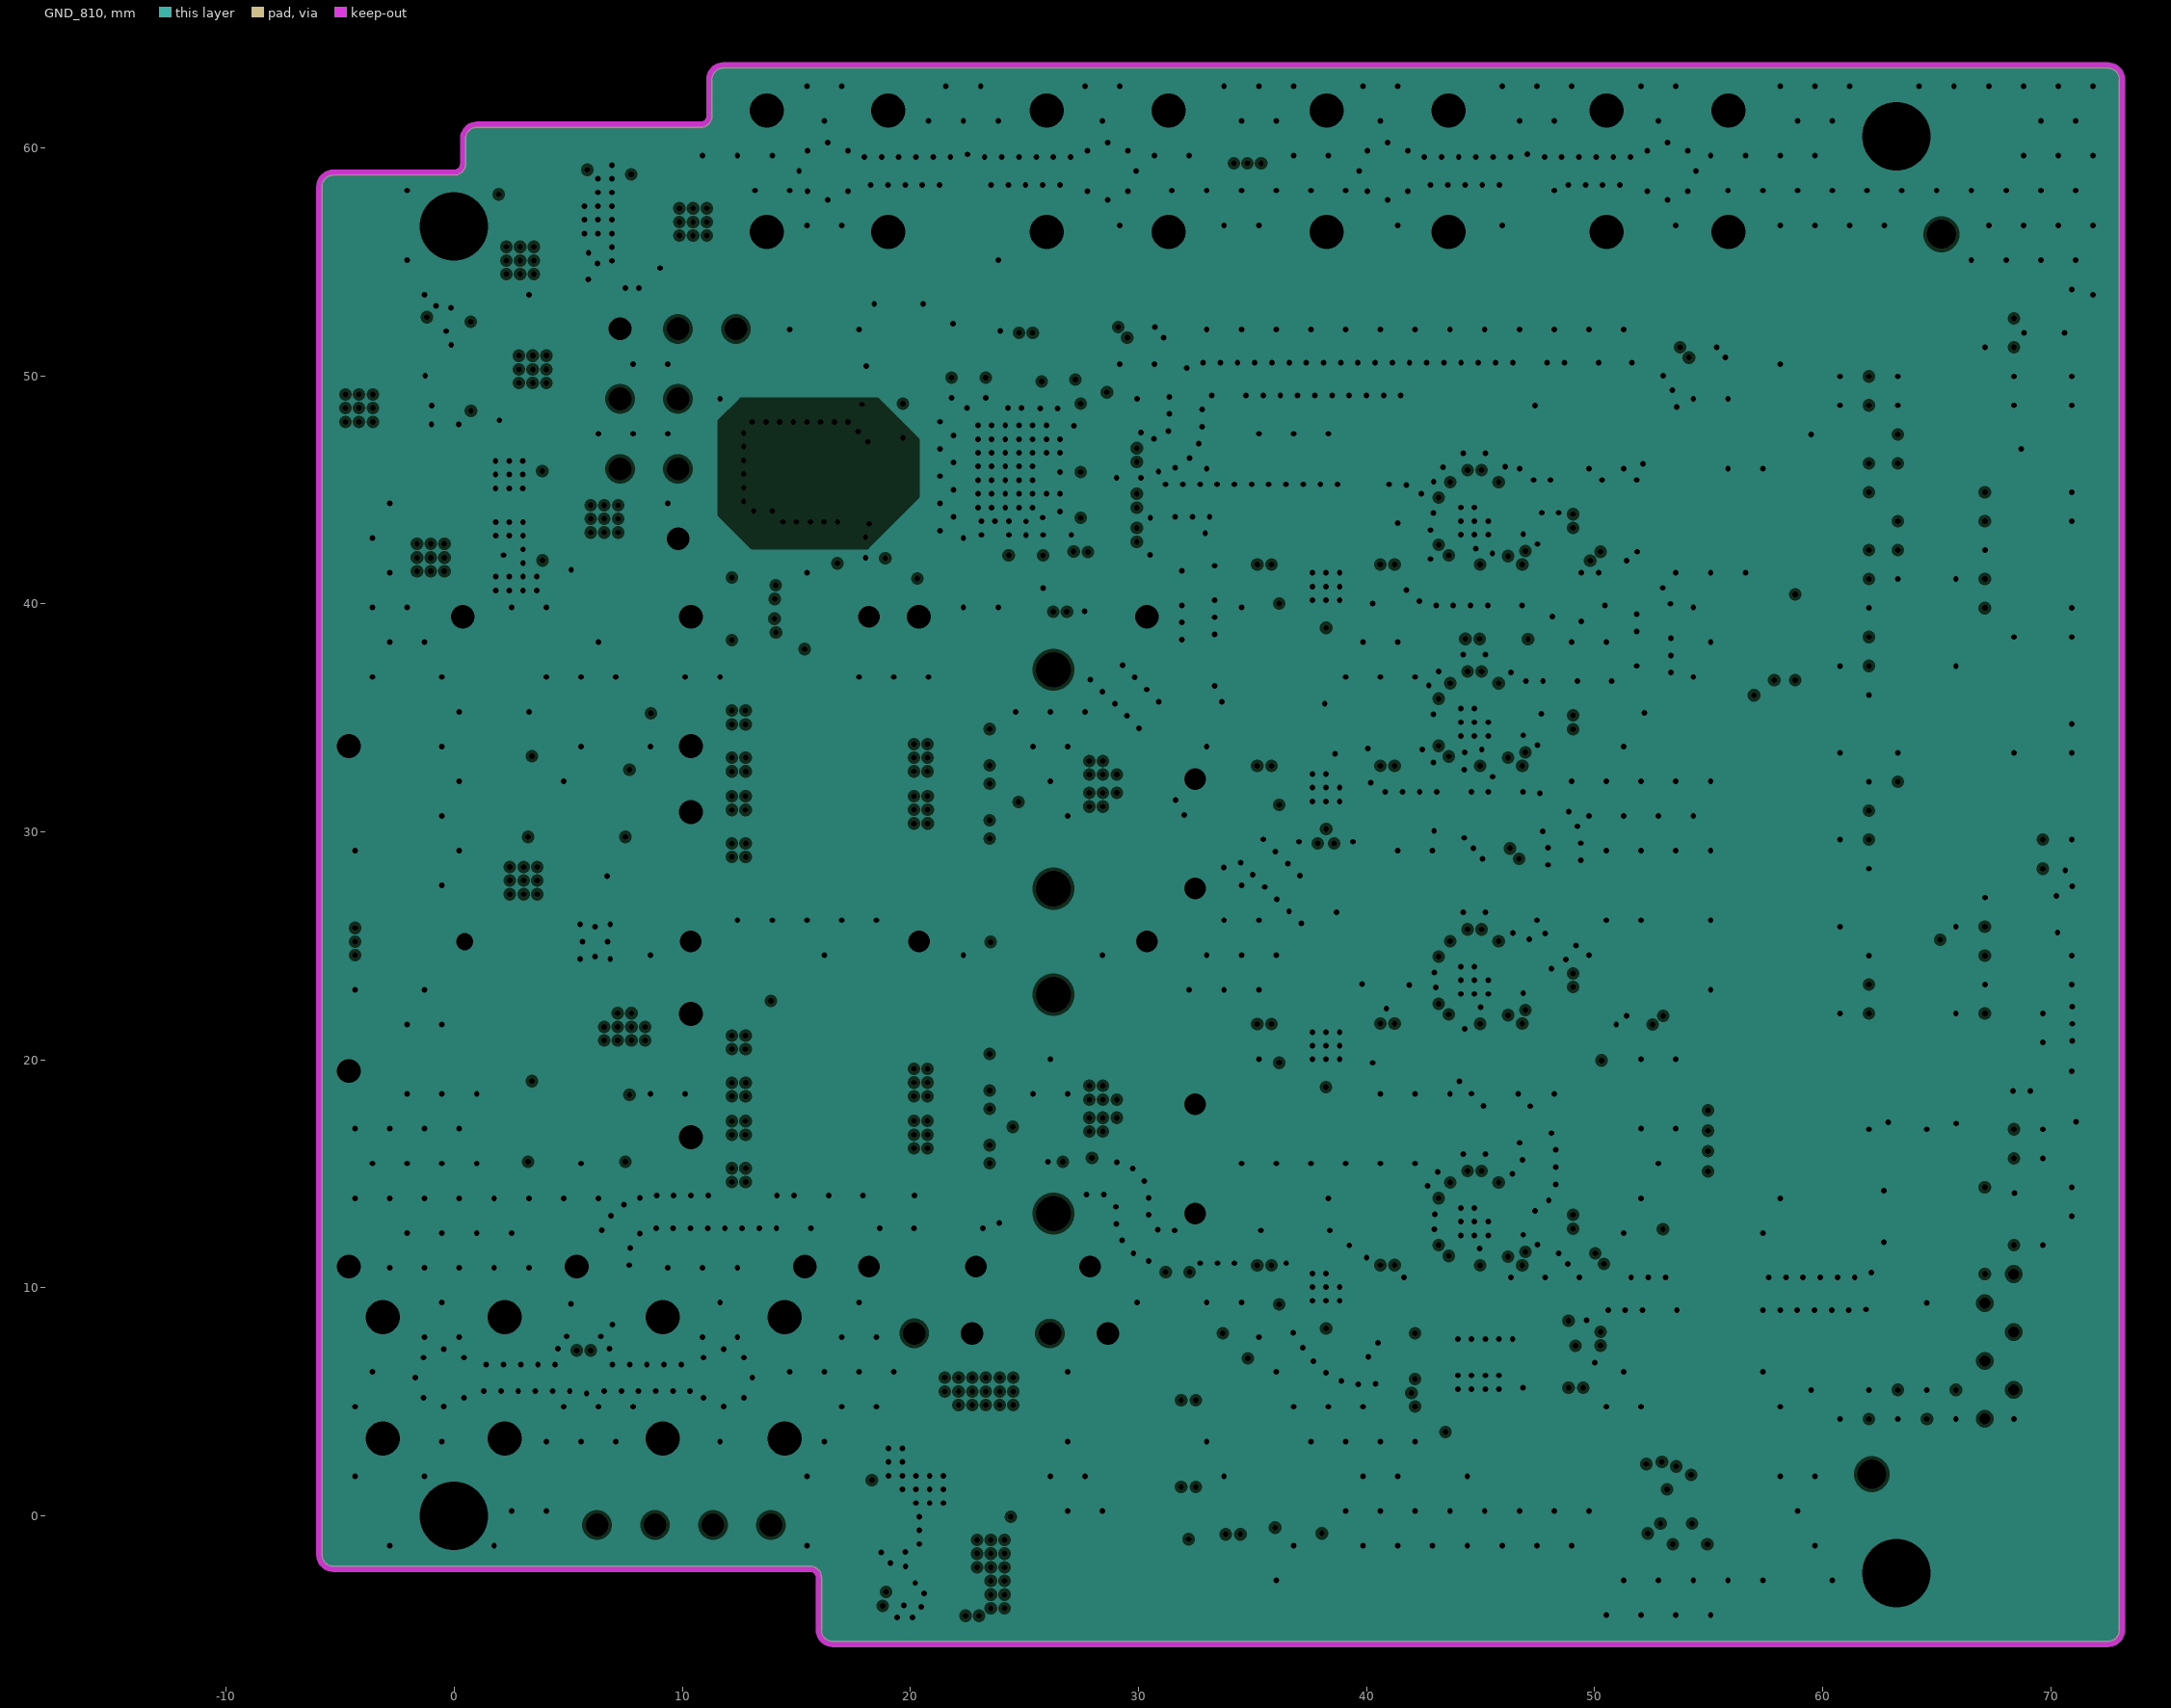
[diagram p9: GND_810, clearances drawn from the general rule]
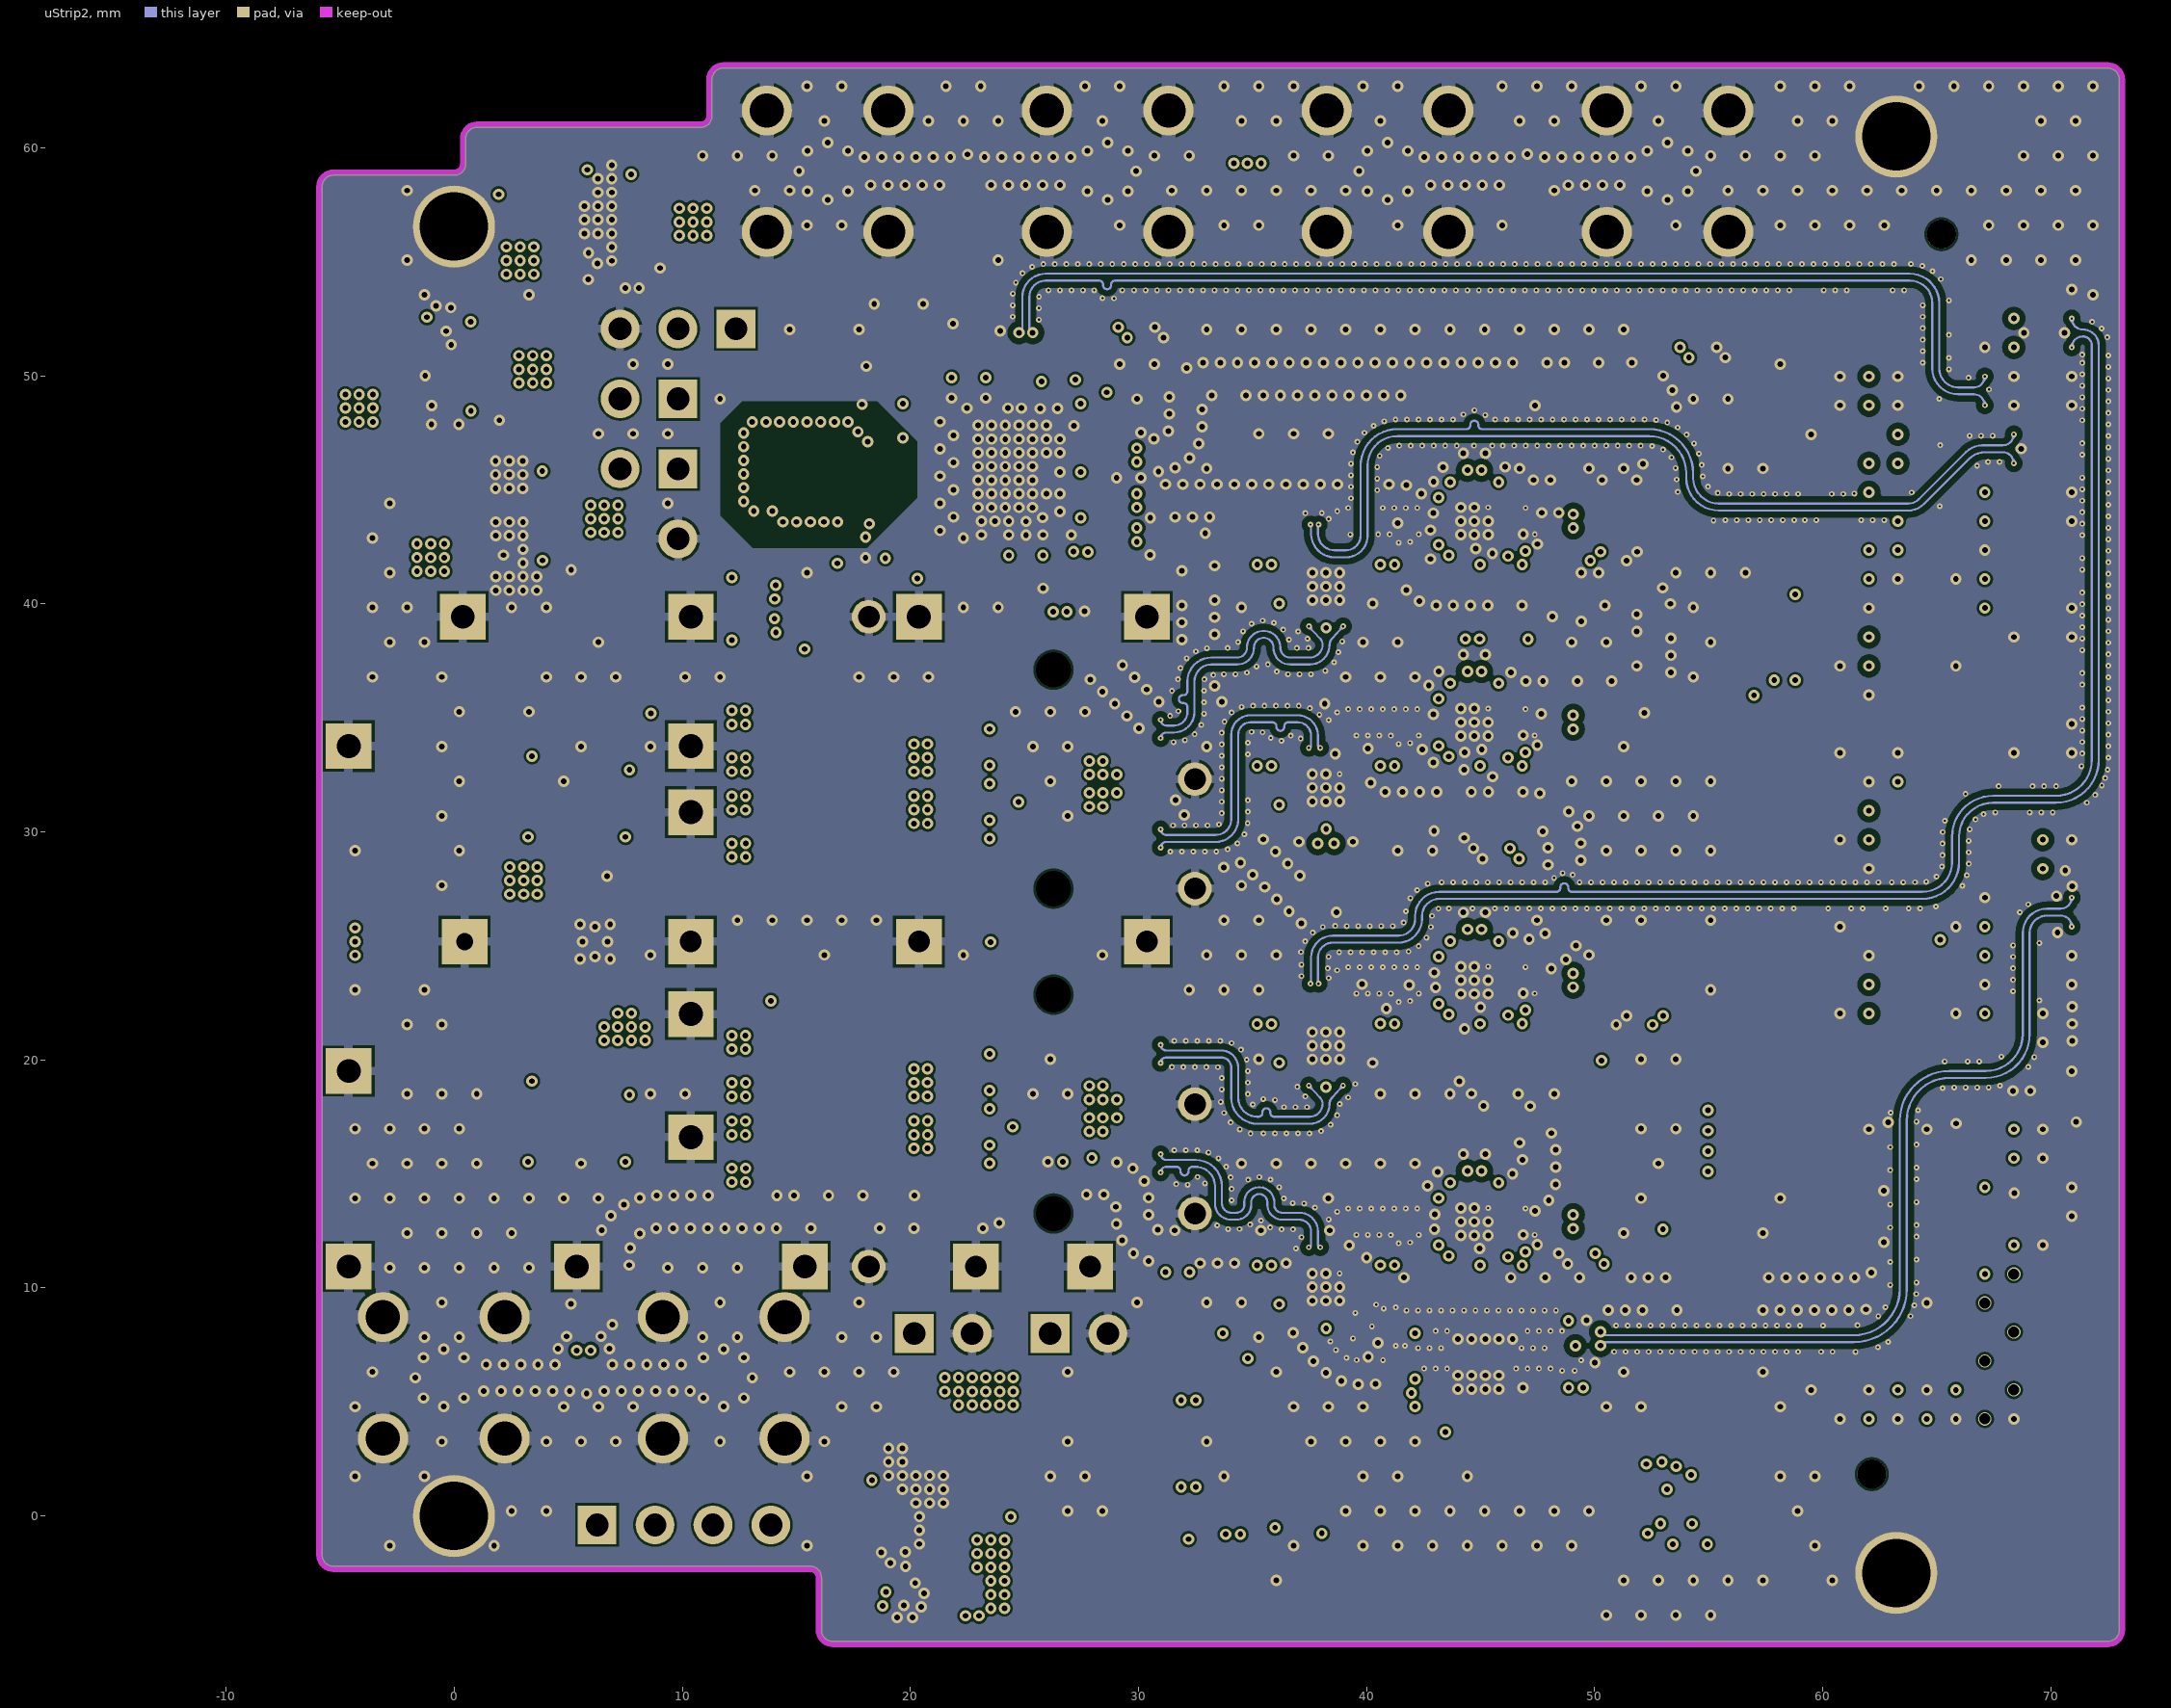
[diagram p10: uStrip2]
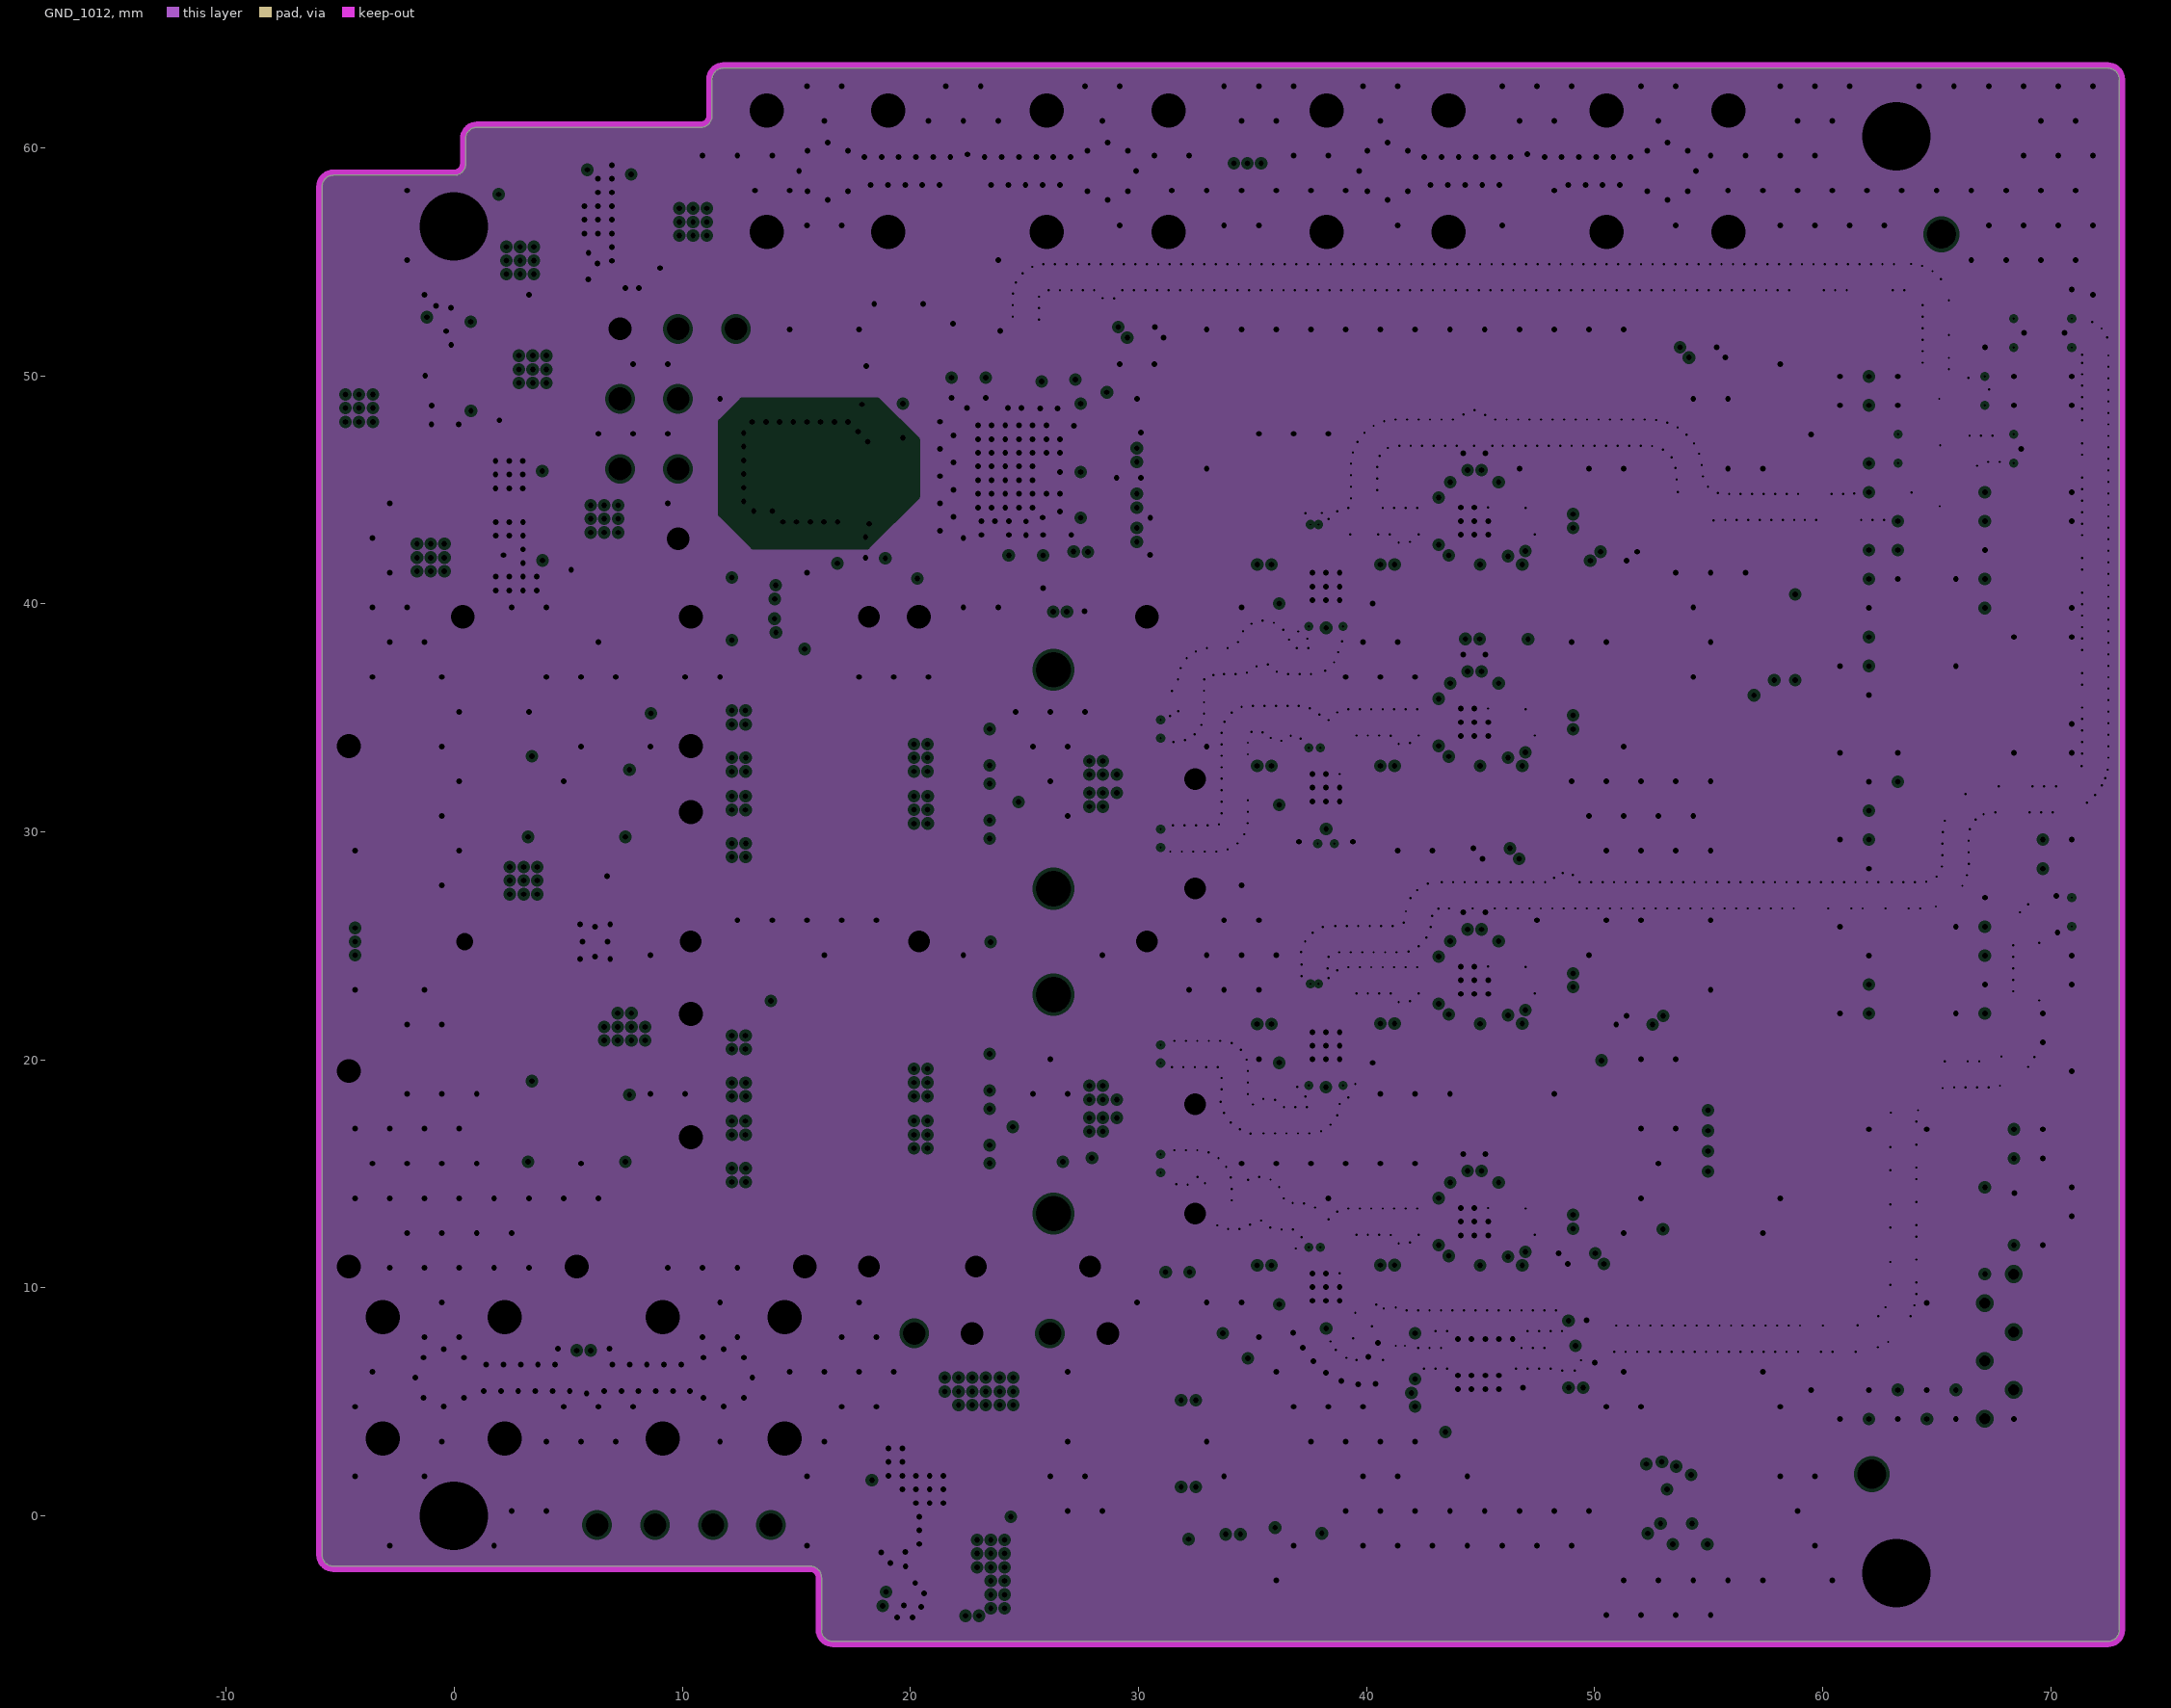
[diagram p11: GND_1012, clearances drawn from the general rule]
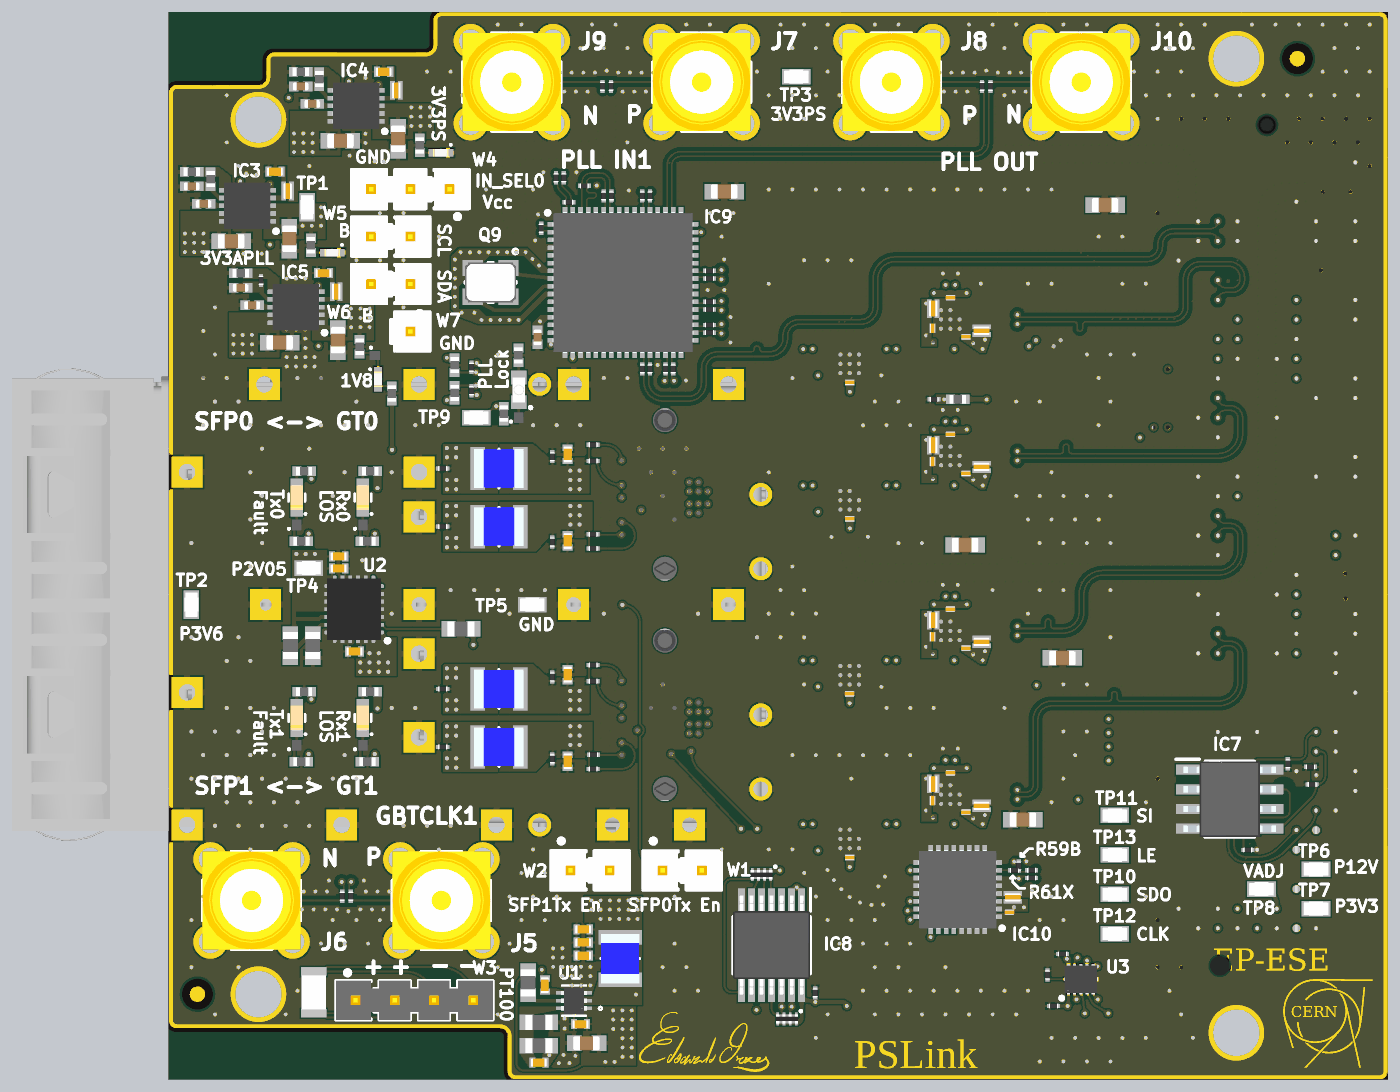
[diagram p17: 3D render of the assembled board from above, using the file's embedded part models]
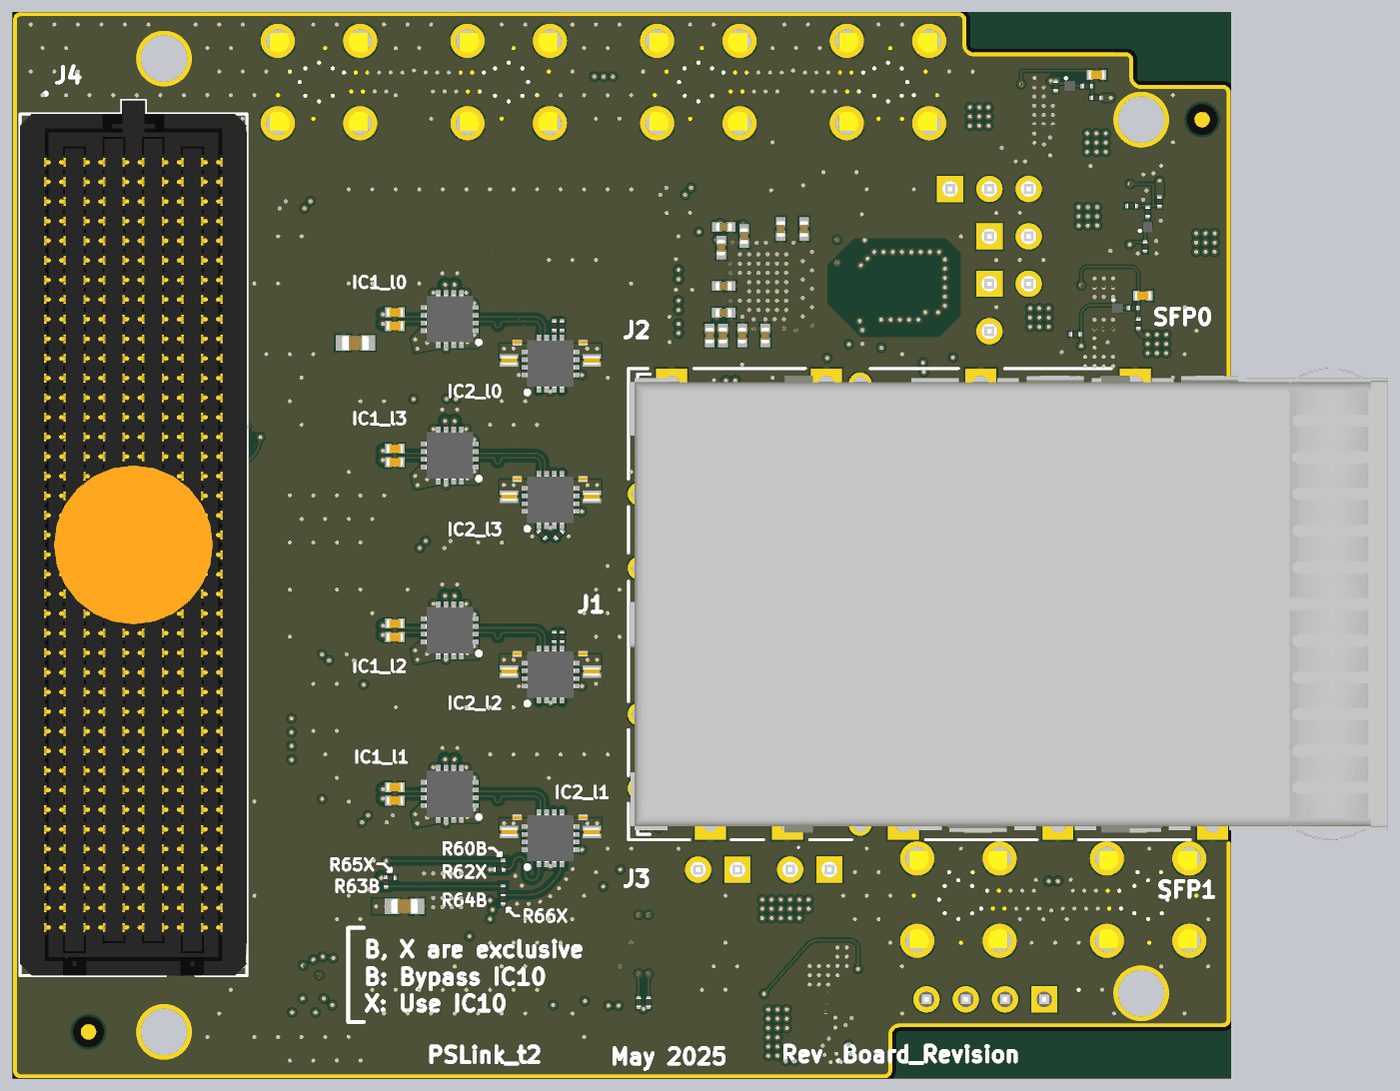
[diagram p18: 3D render of the assembled board from below, using the file's embedded part models]

## Layer stack, top to bottom
Top Solder: solder mask 0.05, Solder Resist, Dk 4.6
Top Layer: signal copper 0.025
Dielectric_Top: prepreg 0.0681, R-5670G, Dk 3.19
GND_12: plane copper 0.025, net (Multiple Nets)
Dielectric_23: prepreg 0.0789, R-5670G, Dk 3.3
uStrip1: signal copper 0.025
Dielectric_34: prepreg 0.1722, R-5670G, Dk 3.15
GND_35: plane copper 0.0175, net GND
Core_45: core 0.5563, R-5775G_1035, Dk 3.75
Clocks: signal copper 0.0175
Dielectric_56: prepreg 0.085, R-5670G, Dk 3.3
GND_57: plane copper 0.0175, net (Multiple Nets)
Core: core 0.75, R-5775G_2116, Dk 3.75
POWER: plane copper 0.0175, net (Multiple Nets)
Dielectric_78: prepreg 0.085, R-5670G, Dk 3.3
Slow_Ctrl: signal copper 0.0175
Core_89: core 0.5563, R-5775G_1035, Dk 3.75
GND_810: plane copper 0.0175, net GND
Dielectric_910: prepreg 0.1722, R-5670G, Dk 3.15
uStrip2: signal copper 0.025
Core_1011: prepreg 0.0789, R-5670G, Dk 3.3
GND_1012: plane copper 0.025, net GND
Dielectric_Bot: prepreg 0.0681, R-5670G, Dk 3.19
Bottom Layer: signal copper 0.025
Bottom Solder: solder mask 0.05, Solder Resist, Dk 4.6

## Board outline
-5.3,-2.2 cw(c-5.3,-1.7) -5.8,-1.7 -5.8,58.3 cw(c-5.3,58.3) -5.3,58.8 -2,58.8 -0.5,58.8 0,58.8 ccw(c0,59.3) 0.5,59.3 0.5,60.4 cw(c1,60.4) 1,60.9 8,60.9 10.4,60.9 10.8,60.9 ccw(c10.8,61.4) 11.3,61.4 11.3,63 cw(c11.8,63) 11.8,63.5 72.5,63.5 cw(c72.5,63) 73,63 73,-5 cw(c72.5,-5) 72.5,-5.5 16.6,-5.5 cw(c16.6,-5) 16.1,-5 16.1,-2.7 ccw(c15.6,-2.7) 15.6,-2.2 14.7,-2.2

## Design rules (kind name [scope] priority, off if disabled: settings)
BackDrilling [IsVia and InNetClass('Back-Drill')] p1: maxstublength=0.001 usetopbackdrill=TRUE usebottombackdrill=TRUE holeoversize=0.25 holetolplus=0.15 holetolminus=0.15
BoardOutlineClearance BoardOutlineClearance_gnd [IsPolygon and InNet('GND')] p1: gap=0 ignorepadtopadclearanceinfootprint=FALSE
BoardOutlineClearance [Not OnBottomSilkscreen and not(HasFootprint ('20072631_NP')) and not(IsPolygon and InNet('GND'))] p2: gap=0.279 ignorepadtopadclearanceinfootprint=FALSE
Clearance Clearance_XTAL [InNet('NetIC7_7')] p1: gap=0.102 ignorepadtopadclearanceinfootprint=FALSE except(0.762: Poly-Poly Poly-Region Region-Region)
Clearance Clearance_via_diff [isVia and InAnyDifferentialPair and not(InNetClass('50ohm'))] p2: gap=0.102 ignorepadtopadclearanceinfootprint=FALSE except(0.254: Via-Poly Via-Region) // generic
Clearance Clearance_Coplanar_top [InAnyDifferentialPair and not(InNetClass('50ohm')) and (OnLayer('Top Layer') or OnLayer('Bottom Layer'))] p3: gap=0.102 ignorepadtopadclearanceinfootprint=FALSE except(0.255: Arc-Poly Arc-Region Track-Poly Track-Region)
Clearance Clearance_Coplanar_ustrip [InAnyDifferentialPair and not(InNetClass('50ohm')) and (OnLayer('uStrip1') or OnLayer('uStrip2'))] p4: gap=0.102 ignorepadtopadclearanceinfootprint=FALSE except(0.258: Arc-Fill Arc-Poly Arc-Region Track-Fill Track-Poly Track-Region)
Clearance Clearance_Coplanar_clocks [InAnyDifferentialPair and not(InNetClass('50ohm')) and OnLayer('Clocks')] p5: gap=0.102 ignorepadtopadclearanceinfootprint=FALSE except(0.248: Arc-Fill Arc-Poly Arc-Region Track-Fill Track-Poly Track-Region)
Clearance Clearance_Coplanar_SE_top [InNetClass('50ohm') and (OnLayer('Top Layer') or OnLayer('Bottom Layer'))] p6: gap=0.102 ignorepadtopadclearanceinfootprint=FALSE except(0.259: Arc-Fill Arc-Poly Arc-Region Track-Fill Track-Poly Track-Region SMDPad-Poly SMDPad-Region THPad-Fill THPad-Poly THPad-Region)
Clearance Clearance_Coplanar_SE_ustrip [InNetClass('50ohm') and (OnLayer('uStrip1') or OnLayer('uStrip2'))] p7: gap=0.102 ignorepadtopadclearanceinfootprint=FALSE except(0.267: Arc-Fill Arc-Poly Arc-Region Track-Fill Track-Poly Track-Region)
Clearance Clearance_Coplanar_SE_clocks [InNetClass('50ohm') and (OnLayer('Clocks'))] p8: gap=0.102 ignorepadtopadclearanceinfootprint=FALSE except(0.249: Arc-Fill Arc-Poly Arc-Region Track-Fill Track-Poly Track-Region)
Clearance Clearance_SMA_pad [HasFootprint('CONSMA022-G') and InNetClass('50ohm')] p9: gap=0.102 ignorepadtopadclearanceinfootprint=FALSE except(0.701: SMDPad-Fill SMDPad-Poly SMDPad-Region)
Clearance Clearance_SMA_pad_pad [HasFootprint('CONSMA022-G')] p10: gap=0.102 ignorepadtopadclearanceinfootprint=TRUE
Clearance Clearance_copper_keepout [InPolygon vs IsKeepOut and OnLayer('Keep-Out Layer')] p11: gap=0 ignorepadtopadclearanceinfootprint=FALSE
Clearance [All] p12: gap=0.102 ignorepadtopadclearanceinfootprint=FALSE
ComponentClearance [All] p1: gap=0.127 collisioncheckmode=3 verticalgap=0 showdistances=FALSE
DiffPairsRouting [InDifferentialPairClass('All Differential Pairs')] p1: maxlimit=0.211 minlimit=0.191 mostfreqgap=0.211 toplayer_mingap=0.206 toplayer_maxgap=0.206 toplayer_prefgap=0.206 toplayer_minwidth=0.099 toplayer_maxwidth=0.099 toplayer_prefwidth=0.099 midlayer1_mingap=0.211 midlayer1_minwidth=0.094 midlayer1_maxwidth=0.094 midlayer1_prefwidth=0.094 midlayer2_maxgap=0.191 midlayer2_prefgap=0.191 midlayer2_minwidth=0.114 midlayer2_maxwidth=0.114 midlayer2_prefwidth=0.114 midlayer3_maxgap=0.191 midlayer3_prefgap=0.191 midlayer3_minwidth=0.114 midlayer3_maxwidth=0.114 midlayer3_prefwidth=0.114 midlayer4_mingap=0.211 midlayer4_minwidth=0.094 midlayer4_maxwidth=0.094 midlayer4_prefwidth=0.094 bottomlayer_mingap=0.206 bottomlayer_maxgap=0.206 bottomlayer_prefgap=0.206 bottomlayer_minwidth=0.099 bottomlayer_maxwidth=0.099 bottomlayer_prefwidth=0.099 impedanceprofiledriven=TRUE impedanceprofileid={CD85431C-F574-403E-97A0-7E398147431C} impedanceprofilevalue=100.000000 maxuncoupledlength=5.08
HoleSize HoleSize_laser [InDrillLayerPair('Top Layer - uStrip1') or InDrillLayerPair('uStrip2 - Bottom Layer')] p1: absolutevalues=TRUE maxlimit=0.1 minlimit=0.1 maxpercent=80.000 minpercent=20.000
HoleSize [All] p2: absolutevalues=TRUE maxlimit=6.5 minlimit=0.25 maxpercent=80.000 minpercent=20.000
HoleToHoleClearance HoleToHoleClearance_BackDrill [BackDrillBottom or BackDrillTop] p1: gap=0 allowstackedmicrovias=TRUE
HoleToHoleClearance HoleToHoleClearance_laser [InDrillLayerPair('Top Layer - uStrip1') or InDrillLayerPair('uStrip2 - Bottom Layer')] p2: gap=0.25 allowstackedmicrovias=TRUE
HoleToHoleClearance [Isvia] p3: gap=0.35 allowstackedmicrovias=TRUE
HoleToHoleClearance HoleToHoleClearance_Standard [All] p4: gap=0.406 allowstackedmicrovias=TRUE
MatchedLengths Match_SFP0_FAN [InNetClass('Match_SFP0_FAN')] p1: tolerance=0.051 checknetsindiffpair=FALSE checkdiffpairvsdiffpair=TRUE checkxsignals=TRUE checkothers=TRUE
MatchedLengths Match_SFP1_FAN [InNetClass('Match_SFP1_FAN')] p2: tolerance=0.053 checknetsindiffpair=FALSE checkdiffpairvsdiffpair=TRUE checkxsignals=TRUE checkothers=TRUE
MatchedLengths Match_FAN_CDR [InNetClass('Match_FAN_CDR')] p3: tolerance=0.051 checknetsindiffpair=FALSE checkdiffpairvsdiffpair=TRUE checkxsignals=TRUE checkothers=TRUE
MatchedLengths Match_FAN_FPGA [InNetClass('Match_FAN_FPGA')] p4: tolerance=0.051 checknetsindiffpair=FALSE checkdiffpairvsdiffpair=TRUE checkxsignals=TRUE checkothers=TRUE
MatchedLengths Match_CDR_DFF [InNetClass('Match_CDR_DFF')] p5: tolerance=0.051 checknetsindiffpair=FALSE checkdiffpairvsdiffpair=TRUE checkxsignals=TRUE checkothers=TRUE
MatchedLengths Match_DFF_FPGA [InNetClass('Match_DFF_FPGA')] p6: tolerance=0.051 checknetsindiffpair=FALSE checkdiffpairvsdiffpair=TRUE checkxsignals=TRUE checkothers=TRUE
MatchedLengths Match_PLL_C_DFF [InNetClass('Match_PLL_C_DFF')] p7: tolerance=0.051 checknetsindiffpair=FALSE checkdiffpairvsdiffpair=TRUE checkxsignals=TRUE checkothers=TRUE
MatchedLengths Match_50Ω_in [InNetClass('Match_50ohm_in')] p8: tolerance=0.051 checknetsindiffpair=FALSE checkdiffpairvsdiffpair=TRUE checkxsignals=TRUE checkothers=TRUE
MatchedLengths Match_50Ω_out [InNetClass('Match_50ohm_out')] p9: tolerance=0.051 checknetsindiffpair=FALSE checkdiffpairvsdiffpair=TRUE checkxsignals=TRUE checkothers=TRUE
MatchedLengths Match_withinDiffPairs [InDifferentialPairClass('All Differential Pairs')] p10: tolerance=0.051 checknetsindiffpair=TRUE checkdiffpairvsdiffpair=FALSE checkxsignals=FALSE checkothers=FALSE
MinimumAnnularRing MinimumAnnularRing_laser [InDrillLayerPair('Top Layer - uStrip1') or InDrillLayerPair('uStrip2 - Bottom Layer')] p1: minimumring=0.075
MinimumAnnularRing [not IsVia] p2: minimumring=0.1
MinimumSolderMaskSliver [All] p1: minsoldermaskwidth=0.051
PlaneClearance [All] p1: clearance=0.152
PlaneConnect PlaneConnect_Frame_Hole [InPadClass('Frame_Holes')] p1: planeconnectstyle=Direct reliefexpansion=0.508 reliefentries=4 reliefconductorwidth=0.254 reliefairgap=0.254
PlaneConnect PlaneConnect_PWR [InComponentClass('PWR_Jumper') or HasFootprint('TE_282837-2')] p2: planeconnectstyle=Relief reliefexpansion=0.508 reliefentries=4 reliefconductorwidth=0.635 reliefairgap=0.178
PlaneConnect [All] p3: pad.planeconnectstyle=Relief pad.reliefexpansion=0.508 pad.reliefentries=4 pad.reliefconductorwidth=0.305 pad.reliefairgap=0.178 via.planeconnectstyle=Direct via.reliefexpansion=0.508 via.reliefentries=4 via.reliefconductorwidth=0.254 via.reliefairgap=0.254
PolygonConnect noThermal [InComponentClass('no_Thermal_Relieves')] p1: connectstyle=Direct reliefconductorwidth=0.254 reliefentries=4 polygonreliefangle="90 Angle" airgapwidth=0.254
PolygonConnect noThermal_chips [IsPad and ((ColumnCount + RowCount > 3) and (ColumnCount > 1) and (RowCount > 1)) and not(HasFootprint('SAMTEC_SMA-J-P-H-ST-MT1') or HasFootprint('20072631_NP'))] p2: connectstyle=Direct reliefconductorwidth=0.254 reliefentries=4 polygonreliefangle="90 Angle" airgapwidth=0.254 // excluding SMA and SFP cage footprints
PolygonConnect noThermal_reversed_c [IsPad and (HasFootprint('LLL03TR61E333KE01') or HasFootprint('CAPC0510X04N'))] p3: connectstyle=Direct reliefconductorwidth=0.254 reliefentries=4 polygonreliefangle="90 Angle" airgapwidth=0.254
PolygonConnect noThermal_inductor [IsPad and HasFootprint('DFE322520FD1R0MP2')] p4: connectstyle=Direct reliefconductorwidth=0.254 reliefentries=4 polygonreliefangle="90 Angle" airgapwidth=0.254
PolygonConnect noThermal_testpoint [IsPad and HasFootprint('TP+195X110')] p5: connectstyle=Direct reliefconductorwidth=0.254 reliefentries=4 polygonreliefangle="90 Angle" airgapwidth=0.254
PolygonConnect PolygonConnect_via [IsVia] p6: connectstyle=Direct reliefconductorwidth=0.254 reliefentries=4 polygonreliefangle="90 Angle" airgapwidth=0.254
PolygonConnect PolygonConnect_Huge [AsMM(PadXSize_AllLayers + PadYSize_AllLayers) > 10] p7: connectstyle=Relief reliefconductorwidth=1.524 reliefentries=4 polygonreliefangle="90 Angle" airgapwidth=0.127
PolygonConnect PolygonConnect_Very_Large [AsMM(PadXSize_AllLayers + PadYSize_AllLayers) > 4] p8: connectstyle=Relief reliefconductorwidth=0.635 reliefentries=4 polygonreliefangle="90 Angle" airgapwidth=0.127
PolygonConnect PolygonConnect_Large [AsMM(PadXSize_AllLayers + PadYSize_AllLayers) > 2.5] p9: connectstyle=Relief reliefconductorwidth=0.381 reliefentries=4 polygonreliefangle="90 Angle" airgapwidth=0.127
PolygonConnect PolygonConnect_Mid [AsMM(PadXSize_AllLayers + PadYSize_AllLayers) >= 1.2] p10: connectstyle=Relief reliefconductorwidth=0.254 reliefentries=4 polygonreliefangle="90 Angle" airgapwidth=0.127
PolygonConnect PolygonConnect_Base [All] p11: connectstyle=Relief reliefconductorwidth=0.127 reliefentries=4 polygonreliefangle="90 Angle" airgapwidth=0.127
RoutingVias RoutingVias_laser [InDrillLayerPair('Top Layer - uStrip1') or InDrillLayerPair('uStrip2 - Bottom Layer')] p1: holewidth=0.1 width=0.25 viastyle="Through Hole" minholewidth=0.1 minwidth=0.25 maxholewidth=0.1 maxwidth=0.25
RoutingVias RoutingVias_buried [InDrillLayerPair('uStrip1 - uStrip2')] p2: holewidth=0.25 width=0.5 viastyle="Through Hole" minholewidth=0.25 minwidth=0.5 maxholewidth=0.25 maxwidth=0.5
RoutingVias RoutingVias_PWR_FMC [IsVia and InNetClass('Power')] p3: holewidth=0.25 width=0.5 viastyle="Through Hole" minholewidth=0.25 minwidth=0.5 maxholewidth=0.483 maxwidth=0.61
RoutingVias [All] p4: holewidth=0.25 width=0.5 viastyle="Through Hole" minholewidth=0.25 minwidth=0.5 maxholewidth=0.4 maxwidth=0.6
SilkToSilkClearance [All] p1: silktosilkclearance=0
SilkToSolderMaskClearance [All] p1: minsilkscreentomaskgap=0.003 clearancetoexposedcopper=FALSE
SilkToSolderMaskClearance SilkToSolderMaskClearance_highspeed [InAnyDifferentialPair or InNetClass('50ohm')] p2: minsilkscreentomaskgap=0.051 clearancetoexposedcopper=TRUE
SolderMaskExpansion SolderMaskExpansion_Via [IsVia] p1: expansion=0.102 istentingtop=TRUE
SolderMaskExpansion [All] p2: expansion=0 istentingtop=FALSE
Width Width_50Ω [InNetClass('50ohm')] p1: maxlimit=0.137 minlimit=0.102 preferedwidth=0.137 toplayer_minwidth=0.117 toplayer_maxwidth=0.117 toplayer_prefwidth=0.117 midlayer1_maxwidth=0.102 midlayer1_prefwidth=0.102 midlayer2_minwidth=0.137 midlayer3_minwidth=0.137 midlayer4_maxwidth=0.102 midlayer4_prefwidth=0.102 bottomlayer_minwidth=0.117 bottomlayer_maxwidth=0.117 bottomlayer_prefwidth=0.117 impedanceprofiledriven=TRUE impedanceprofileid={F476641D-9FE5-4795-9573-682EE7DBAEBE} impedanceprofilevalue=50.000000 minimp=50.000000 maximp=50.000000 favimp=50.000000
Width [All] p2: maxlimit=2.54 minlimit=0.089 preferedwidth=0.137 toplayer_prefwidth=0.117 midlayer1_prefwidth=0.102 midlayer4_prefwidth=0.102 bottomlayer_prefwidth=0.117 impedanceprofiledriven=TRUE impedanceprofileid={F476641D-9FE5-4795-9573-682EE7DBAEBE} impedanceprofilevalue=50.000000 minimp=50.000000 maximp=50.000000 favimp=50.000000
21 further rules are at their usual default settings.

## Classes and differential pairs
pad class Frame_Holes: Free-frame-holes
channel class lane: l0 l1 l2 l3
net class 50ohm: BYPASS_N BYPASS_P FPGA_TX1_PS_N FPGA_TX1_PS_P NetC67_2 NetC68_2 NetIC10_7 NetIC10_18 PLL_IN_AUX_N PLL_IN_AUX_P PLL_SMA_OUT_N PLL_SMA_OUT_P
net class Match_PLL_C_DFF: DMTD_CLK_0_N DMTD_CLK_0_P DMTD_CLK_1_N DMTD_CLK_1_P DMTD_CLK_2_N DMTD_CLK_2_P DMTD_CLK_3_N DMTD_CLK_3_P
net class Back-Drill: CLN_RXUSRCLK_N CLN_RXUSRCLK_P DDCLK0_N DDCLK0_P DDCLK1_N DDCLK1_P DDCLK2_N DDCLK2_P DDCLK3_N DDCLK3_P DDCLK4_N DDCLK4_P DMTD_CLK_0_N DMTD_CLK_0_P DMTD_CLK_1_N DMTD_CLK_1_P DMTD_CLK_2_N DMTD_CLK_2_P DMTD_CLK_3_N DMTD_CLK_3_P DMTD_CLK_FPGA_N DMTD_CLK_FPGA_P GT_REFCLK_AUX_N GT_REFCLK_AUX_P IN0_N IN0_P IN1_N IN1_P PLL_OUT_N PLL_OUT_P PLL_OUTA_N PLL_OUTA_P RXUSRCLK_N RXUSRCLK_P
net class Match_50ohm_out: FPGA_TX1_PS_N FPGA_TX1_PS_P
net class Match_SFP1_FAN: SFP_RX1_N SFP_RX1_P SFP_TX1_N SFP_TX1_P
component class U_phase-shifters: C103 C104 C105 C106 C107 IC10 R59B R60B R61X R62X R63B R64B R65X R66X TP11 TP12 TP13 U3
net class Match_SFP0_FAN: SFP_RX0_N SFP_RX0_P SFP_TX0_N SFP_TX0_P
net class Match_FAN_DFF: DFF_IN_l0_N DFF_IN_l0_P DFF_IN_l1_N DFF_IN_l1_P DFF_IN_l2_N DFF_IN_l2_P DFF_IN_l3_N DFF_IN_l3_P
net class Power: 1V8 3V3APLL 3V3PS P2V05 P3V3 P3V3A P3V6 P12V VADJ VREFAC
component class U_SFP: C45 C46 C47 C48 C49 C50 C51 C52 C53 C54 C55 C56 IC6 J1 J2 J3 L2 L3 L4 L5 LED1 LED2 LED3 LED4 Q5 Q6 Q7 Q8 R28 R29 R30 R32 R35 R37 R38 R40 R43 W1 W2 W3
component class U_PLL: C69 C70 C71 C72 C73 C74 C75 C76 C77 C78 C79 C80 C81 C82 C83 C84 C85 C86 C87 C88 C89 C90 C91 C92 C93 C94 C95 C96 C97 C98 C99 C100 C101 C102 D4 IC9 J7 J8 J9 J10 Q9 Q10 R48 R51 R53 R55 R57 TP11 W4 W5 W6 W7
component class U_FMC: C57 C58 C59 C60 C61 C62 C63 C64 C65 C66 C67 C68 IC7 IC8 J4 J5 J6 R44 R45 R48 RN1 RN2 TP7 TP12
differential pair DFF_IN_l3: +DFF_IN_l3_P -DFF_IN_l3_N
differential pair DFF_IN_l2: +DFF_IN_l2_P -DFF_IN_l2_N
differential pair DFF_IN_l1: +DFF_IN_l1_P -DFF_IN_l1_N
differential pair DFF_IN_l0: +DFF_IN_l0_P -DFF_IN_l0_N
differential pair BEAT_l3: +BEAT_l3_P -BEAT_l3_N
differential pair BEAT_l2: +BEAT_l2_P -BEAT_l2_N
differential pair BEAT_l1: +BEAT_l1_P -BEAT_l1_N
differential pair BEAT_l0: +BEAT_l0_P -BEAT_l0_N
differential pair DMTD_CLK_3: +DMTD_CLK_3_P -DMTD_CLK_3_N
differential pair DMTD_CLK_2: +DMTD_CLK_2_P -DMTD_CLK_2_N
differential pair DMTD_CLK_1: +DMTD_CLK_1_P -DMTD_CLK_1_N
differential pair DMTD_CLK_0: +DMTD_CLK_0_P -DMTD_CLK_0_N
differential pair RXUSRCLK: +RXUSRCLK_P -RXUSRCLK_N
differential pair IN0: +IN0_P -IN0_N
differential pair FPGA_TX1_C: +FPGA_TX1_C_P -FPGA_TX1_C_N
differential pair FPGA_TX1: +FPGA_TX1_P -FPGA_TX1_N
differential pair FPGA_TX0: +FPGA_TX0_P -FPGA_TX0_N
differential pair FPGA_RX1_C: +FPGA_RX1_C_P -FPGA_RX1_C_N
differential pair FPGA_RX0_C: +FPGA_RX0_C_P -FPGA_RX0_C_N
differential pair SFP_TX1: +SFP_TX1_P -SFP_TX1_N
differential pair SFP_TX0: +SFP_TX0_P -SFP_TX0_N
differential pair SFP_RX1: +SFP_RX1_P -SFP_RX1_N
differential pair SFP_RX0: +SFP_RX0_P -SFP_RX0_N
differential pair PLL_OUT: +PLL_OUT_P -PLL_OUT_N
differential pair PLL_OUTA: +PLL_OUTA_P -PLL_OUTA_N
differential pair IN1: +IN1_P -IN1_N
differential pair GT_REFCLK_AUX: +GT_REFCLK_AUX_P -GT_REFCLK_AUX_N
differential pair FPGA_TX0_C: +FPGA_TX0_C_P -FPGA_TX0_C_N
differential pair FPGA_RX1: +FPGA_RX1_P -FPGA_RX1_N
differential pair FPGA_RX0: +FPGA_RX0_P -FPGA_RX0_N
differential pair FB_OUT: +FB_OUT_P -FB_OUT_N
differential pair FB_IN: +FB_IN_P -FB_IN_N
differential pair DMTD_CLK_FPGA: +DMTD_CLK_FPGA_P -DMTD_CLK_FPGA_N
differential pair DDCLK4: +DDCLK4_P -DDCLK4_N
differential pair DDCLK3: +DDCLK3_P -DDCLK3_N
differential pair DDCLK2: +DDCLK2_P -DDCLK2_N
differential pair DDCLK1: +DDCLK1_P -DDCLK1_N
differential pair DDCLK0: +DDCLK0_P -DDCLK0_N
differential pair CLN_RXUSRCLK: +CLN_RXUSRCLK_P -CLN_RXUSRCLK_N
differential pair BEAT_3: +BEAT_3_P -BEAT_3_N
differential pair BEAT_2: +BEAT_2_P -BEAT_2_N
differential pair BEAT_1: +BEAT_1_P -BEAT_1_N
differential pair BEAT_0: +BEAT_0_P -BEAT_0_N

## Components (designator, comment, footprint, x,y, rotation, side; value= is the part's Value field where it differs from the comment)
C1_l0 "470nF" CAPC0510X04N 35.541,40.965 r90 bottom (schematic designator C1)
C1_l1 "470nF" CAPC0510X04N 35.54,20.829 r90 bottom (schematic designator C1)
C1_l2 "470nF" CAPC0510X04N 40.894,10.44 r90 bottom (schematic designator C1)
C1_l3 "470nF" CAPC0510X04N 35.54,32.138 r90 bottom (schematic designator C1)
C2_l0 "33nF" LLL03TR61E333KE01 36.109,42.119 r270 bottom (schematic designator C2)
C2_l1 "33nF" LLL03TR61E333KE01 36.108,21.983 r270 bottom (schematic designator C2)
C2_l2 "33nF" LLL03TR61E333KE01 40.371,11.392 r270 bottom (schematic designator C2)
C2_l3 "33nF" LLL03TR61E333KE01 36.108,33.294 r270 bottom (schematic designator C2)
C3_l0 "470nF" CAPC0510X04N 40.896,40.964 r90 bottom (schematic designator C3)
C3_l1 "470nF" CAPC0510X04N 40.894,20.826 r90 bottom (schematic designator C3)
C3_l2 "470nF" CAPC0510X04N 35.54,10.432 r90 bottom (schematic designator C3)
C3_l3 "470nF" CAPC0510X04N 40.894,32.148 r90 bottom (schematic designator C3)
C4_l0 "33nF" LLL03TR61E333KE01 40.373,42.12 r270 bottom (schematic designator C4)
C4_l1 "33nF" LLL03TR61E333KE01 40.371,21.972 r270 bottom (schematic designator C4)
C4_l2 "33nF" LLL03TR61E333KE01 36.108,11.384 r270 bottom (schematic designator C4)
C4_l3 "33nF" LLL03TR61E333KE01 40.371,33.293 r270 bottom (schematic designator C4)
C5_l0 "470nF" CAPC0510X04N 43.617,44.339 r180 top (schematic designator C5)
C5_l1 "470nF" CAPC0510X04N 43.617,13.6 r180 top (schematic designator C5)
C5_l2 "470nF" CAPC0510X04N 43.617,24.192 r180 top (schematic designator C5)
C5_l3 "470nF" CAPC0510X04N 43.617,35.507 r180 top (schematic designator C5)
C6_l0 "33nF" LLL03TR61E333KE01 45.737,42.509 r270 top (schematic designator C6)
C6_l1 "33nF" LLL03TR61E333KE01 45.736,11.778 r270 top (schematic designator C6)
C6_l2 "33nF" LLL03TR61E333KE01 45.736,22.377 r270 top (schematic designator C6)
C6_l3 "33nF" LLL03TR61E333KE01 45.736,33.677 r270 top (schematic designator C6)
C7_l0 "10uF" CAPC1608X87N 49.417,11.289 r0 top (schematic designator C7)
C7_l1 "10uF" CAPC1608X87N 51.972,21.744 r0 top (schematic designator C7)
C7_l2 "10uF" CAPC1608X87N 50.834,42.095 r180 bottom (schematic designator C7)
C7_l3 "10uF" CAPC1608X87N 54.738,51.034 r180 top (schematic designator C7)
C8_l0 "470nF" CAPC0510X04N 46.747,42.907 r270 top (schematic designator C8)
C8_l1 "470nF" CAPC0510X04N 46.745,12.176 r270 top (schematic designator C8)
C8_l2 "470nF" CAPC0510X04N 46.745,22.781 r270 top (schematic designator C8)
C8_l3 "470nF" CAPC0510X04N 46.745,34.097 r270 top (schematic designator C8)
C9_l0 "33nF" LLL03TR61E333KE01 43.578,43.062 r180 top (schematic designator C9)
C9_l1 "33nF" LLL03TR61E333KE01 43.578,12.519 r180 top (schematic designator C9)
C9_l2 "33nF" LLL03TR61E333KE01 43.578,23.119 r180 top (schematic designator C9)
C9_l3 "33nF" LLL03TR61E333KE01 43.578,34.449 r180 top (schematic designator C9)
C10_l0 "22uF" MURATA_HI_DENSITY_0402_CAP 48.286,43.196 r180 bottom (schematic designator C10)
C10_l1 "22uF" MURATA_HI_DENSITY_0402_CAP 48.285,12.469 r180 bottom (schematic designator C10)
C10_l2 "22uF" MURATA_HI_DENSITY_0402_CAP 48.285,23.059 r180 bottom (schematic designator C10)
C10_l3 "22uF" MURATA_HI_DENSITY_0402_CAP 48.285,34.373 r180 bottom (schematic designator C10)
C11_l0 "22uF" MURATA_HI_DENSITY_0402_CAP 48.286,44.072 r180 bottom (schematic designator C11)
C11_l1 "22uF" MURATA_HI_DENSITY_0402_CAP 48.285,13.345 r180 bottom (schematic designator C11)
C11_l2 "22uF" MURATA_HI_DENSITY_0402_CAP 48.285,23.935 r180 bottom (schematic designator C11)
C11_l3 "22uF" MURATA_HI_DENSITY_0402_CAP 48.285,35.249 r180 bottom (schematic designator C11)
C12_l0 "33nF" LLL03TR61E333KE01 38.219,39.561 r270 top (schematic designator C12)
C12_l1 "33nF" LLL03TR61E333KE01 38.218,8.835 r270 top (schematic designator C12)
C12_l2 "33nF" LLL03TR61E333KE01 38.209,19.422 r270 top (schematic designator C12)
C12_l3 "33nF" LLL03TR61E333KE01 38.218,30.736 r270 top (schematic designator C12)
C13_l0 "33nF" LLL03TR61E333KE01 44.732,14.311 r90 top (schematic designator C13)
C13_l1 "33nF" LLL03TR61E333KE01 44.732,24.903 r90 top (schematic designator C13)
C13_l2 "33nF" LLL03TR61E333KE01 44.732,36.213 r90 top (schematic designator C13)
C13_l3 "33nF" LLL03TR61E333KE01 44.734,45.038 r90 top (schematic designator C13)
C14 "100nF" MURATA_HI_DENSITY_0201 0.602,50.961 r180 bottom
C15 "10uF" CAPC1608X87N -1.779,48.696 r180 top
C16 "10uF" CAPC1608X87N 1.984,48.856 r90 top
C17 "1uF" CAPC1005X55N -4.326,52.24 r0 top
C18 "22uF" MURATA_HI_DENSITY_0402_CAP 1.053,53.19 r0 top
C19 "470nF" CAPC0510X04N 1.871,51.94 r180 top
C20 "1uF" CAPC1005X55N -3.566,51.111 r0 top
C21 "100nF" MURATA_HI_DENSITY_0402_CAP 20.812,-1.938 r180 top value=22uF
C22 "100nF" MURATA_HI_DENSITY_0402_CAP 18.513,0.591 r270 top value=22uF
C23 "100nF" MURATA_HI_DENSITY_0402_CAP 20.985,2.489 r180 top value=22uF
C24 "22uF" MURATA_HI_DENSITY_0402_CAP 20.985,3.343 r0 top
C25 "22uF" MURATA_HI_DENSITY_0402_CAP 20.985,4.197 r0 top
C26 "10uF" CAPC1608X87N 21.203,-3.166 r0 top
C27 "10uF" CAPC1608X87N 5.286,55.184 r180 top
C28 "10uF" CAPC1608X87N 9.016,55.318 r90 top
C29 "22pF" MURATA_HI_DENSITY_0402_CAP 18.122,-4.422 r0 top value=22uF
C30 "1uF" CAPC1005X55N 2.727,58.701 r0 top
C31 "22uF" MURATA_HI_DENSITY_0402_CAP 8.086,59.652 r0 top
C32 "470nF" CAPC0510X04N 8.904,58.449 r180 top
C33 "1uF" CAPC1005X55N 3.467,57.573 r0 top
C34 "22uF" MURATA_HI_DENSITY_0402_CAP 5.168,28.315 r180 top
C35 "22uF" MURATA_HI_DENSITY_0402_CAP 5.168,27.536 r180 top
C36 "22uF" MURATA_HI_DENSITY_0402_CAP 6.195,22.162 r0 top
C37 "10uF" CAPC1608X87N 1.361,42.141 r180 top
C38 "10uF" CAPC1608X87N 5.123,42.301 r90 top
C39 "1uF" CAPC1005X55N -1.166,45.686 r0 top
C40 "22uF" MURATA_HI_DENSITY_0402_CAP 4.193,46.635 r0 top
C41 "470nF" CAPC0510X04N 5.01,45.432 r180 top
C42 "1uF" CAPC1005X55N -0.426,44.556 r0 top
C43 "22pF" MURATA_HI_DENSITY_0402_CAP 2.875,59.45 r180 bottom value=22uF
C44 "22pF" MURATA_HI_DENSITY_0402_CAP -0.126,45.153 r180 bottom value=22uF
C45 "100nF" MURATA_HI_DENSITY_0201 18.992,34.762 r270 top
C46 "22uF" MURATA_HI_DENSITY_0402_CAP 19.982,34.912 r270 top
C47 "100nF" MURATA_HI_DENSITY_0201 11.903,33.992 r0 top
C48 "100nF" MURATA_HI_DENSITY_0201 18.992,29.238 r90 top
C49 "22uF" MURATA_HI_DENSITY_0402_CAP 19.982,29.313 r90 top
C50 "100nF" MURATA_HI_DENSITY_0201 11.903,30.238 r0 top
C51 "100nF" MURATA_HI_DENSITY_0201 18.992,20.515 r270 top
C52 "22uF" MURATA_HI_DENSITY_0402_CAP 19.982,20.665 r270 top
C53 "100nF" MURATA_HI_DENSITY_0201 11.903,19.74 r0 top
C54 "100nF" MURATA_HI_DENSITY_0201 18.992,15.215 r90 top
C55 "22uF" MURATA_HI_DENSITY_0402_CAP 19.982,15.065 r90 top
C56 "100nF" MURATA_HI_DENSITY_0201 11.903,15.99 r0 top
C57 "100nF" MURATA_HI_DENSITY_0201 38.773,29.686 r225 bottom
C58 "100nF" MURATA_HI_DENSITY_0201 37.662,29.686 r315 bottom
C59 "100nF" MURATA_HI_DENSITY_0201 49.986,8.013 r0 top
C60 "100nF" MURATA_HI_DENSITY_0201 49.986,7.513 r0 top
C61 "100nF" MURATA_HI_DENSITY_0201 37.969,43.209 r270 bottom
C62 "100nF" MURATA_HI_DENSITY_0201 37.469,43.209 r270 bottom
C63 "100nF" MURATA_HI_DENSITY_0201 37.968,23.069 r270 bottom
C64 "100nF" MURATA_HI_DENSITY_0201 37.468,23.069 r270 bottom
C65 "100nF" MURATA_HI_DENSITY_0201 68.015,14.703 r180 top
C66 "100nF" MURATA_HI_DENSITY_0201 35.99,0.083 r270 top
C67 "100nF" MURATA_HI_DENSITY_0201 5.951,6.337 r270 top
C68 "100nF" MURATA_HI_DENSITY_0201 5.401,6.337 r270 top
C69 "100nF" MURATA_HI_DENSITY_0201 24.809,51.623 r90 top
C70 "100nF" MURATA_HI_DENSITY_0201 25.308,51.623 r90 top
C71 "100nF" MURATA_HI_DENSITY_0201 22.782,58.706 r90 top
C72 "100nF" MURATA_HI_DENSITY_0201 22.808,51.623 r270 top
C73 "100nF" MURATA_HI_DENSITY_0201 46.782,58.706 r90 top
C74 "100nF" MURATA_HI_DENSITY_0201 22.232,58.706 r90 top
C75 "100nF" MURATA_HI_DENSITY_0201 22.309,51.623 r270 top
C76 "100nF" MURATA_HI_DENSITY_0201 47.332,58.706 r90 top
C77 "100nF" MURATA_HI_DENSITY_0201 19.727,52.8 r90 top
C78 "100nF" MURATA_HI_DENSITY_0201 29.151,46.78 r0 top
C79 "100nF" MURATA_HI_DENSITY_0201 19.228,52.8 r90 top
C80 "100nF" MURATA_HI_DENSITY_0201 29.151,46.281 r0 top
C81 "100nF" MURATA_HI_DENSITY_0201 29.151,44.78 r0 top
C82 "100nF" MURATA_HI_DENSITY_0201 29.151,44.281 r0 top
C83 "100nF" MURATA_HI_DENSITY_0201 29.151,43.28 r0 top
C84 "100nF" MURATA_HI_DENSITY_0201 29.151,42.781 r0 top
C85 "100nF" MURATA_HI_DENSITY_0201 26.808,40.437 r270 top
C86 "100nF" MURATA_HI_DENSITY_0201 26.309,40.437 r270 top
C87 "1uF" CAPC1005X55N 18.033,42.48 r90 top
C88 "1uF" CAPC1005X55N 27.053,42.58 r270 bottom
C89 "1uF" CAPC1005X55N 27.164,48.269 r90 bottom
C90 "1uF" CAPC1005X55N 21.808,49.48 r90 bottom
C91 "100nF" MURATA_HI_DENSITY_0201 25.308,40.437 r270 top
C92 "100nF" MURATA_HI_DENSITY_0201 24.809,40.437 r270 top
C93 "1uF" CAPC1005X55N 25.683,49.017 r90 bottom
C94 "1uF" CAPC1005X55N 24.308,42.58 r270 bottom
C95 "1uF" CAPC1005X55N 25.808,42.58 r270 bottom
C96 "1uF" CAPC1005X55N 26.99,49.61 r0 bottom
C97 "1uF" CAPC1005X55N 23.308,49.48 r90 bottom
C98 "1uF" CAPC1005X55N 27.008,45.78 r0 bottom
C99 "1uF" CAPC1005X55N 27.008,44.05 r0 bottom
C100 "1uF" CAPC1005X55N 27.916,42.58 r270 bottom
C101 "10uF" CAPC1608X87N 30.108,51.908 r180 top
C102 "10uF" CAPC1608X87N 45.684,29.049 r0 top
C103 "10uF" CAPC1608X87N 47.662,5.631 r0 bottom
C104 "470nF" CAPC0510X04N 48.776,6.263 r270 top
C105 "33nF" LLL03TR61E333KE01 48.556,5.303 r90 top
C106 "100nF" MURATA_HI_DENSITY_0201 51.403,-0.761 r0 top
C107 "100nF" MURATA_HI_DENSITY_0201 51.983,2.606 r0 top
D1 "APHHS1005LZGCK-V" LED_APHHS1005LZGCK-V 4.753,47.956 r180 top
D2 "APHHS1005LZGCK-V" LED_APHHS1005LZGCK-V 11.785,54.418 r180 top
D3 "APHHS1005LZGCK-V" LED_APHHS1005LZGCK-V 7.713,39.774 r270 top
D4 "APTD1608LVBC_D" LEDC1608X110N 16.821,39.078 r90 top
FTG1 "Use only in PCB" FIDUCIAL_TOP_C100-200 67.172,60.499 r180 top
FTG2 "Use only in PCB" FIDUCIAL_TOP_C100-200 68.113,-2.499 r0 bottom
FTG3 "Use only in PCB" FIDUCIAL_TOP_C100-200 -3.96,56.551 r0 bottom
FTG4 "Use only in PCB" FIDUCIAL_TOP_C100-200 -3.96,0 r180 top
IC1_l0 "NB7V52MMNG" QFN50P300X300X100-17N 44.729,43.634 r0 bottom (schematic designator IC1)
IC1_l1 "NB7V52MMNG" QFN50P300X300X100-17N 44.728,12.907 r0 bottom (schematic designator IC1)
IC1_l2 "NB7V52MMNG" QFN50P300X300X100-17N 44.728,23.497 r0 bottom (schematic designator IC1)
IC1_l3 "NB7V52MMNG" QFN50P300X300X100-17N 44.728,34.811 r0 bottom (schematic designator IC1)
IC2_l0 "NB7VQ14MMNHTBG" QFN50P300X300X100-17N 38.219,40.766 r90 bottom (schematic designator IC2)
IC2_l1 "NB7VQ14MMNHTBG" QFN50P300X300X100-17N 38.218,10.039 r90 bottom (schematic designator IC2)
IC2_l2 "NB7VQ14MMNHTBG" QFN50P300X300X100-17N 38.218,20.626 r90 bottom (schematic designator IC2)
IC2_l3 "NB7VQ14MMNHTBG" QFN50P300X300X100-17N 38.218,31.94 r90 bottom (schematic designator IC2)
IC3 "ADP7159ACPZ-04-R7" SON50P300X300X85-11N-D -0.732,50.987 r180 top
IC4 "ADP7159ACPZ-04-R7" SON50P300X300X85-11N-D 6.301,57.449 r180 top
IC5 "ADP7159ACPZ-04-R7" SON50P300X300X85-11N-D 2.408,44.432 r180 top
IC6 "32207590" PT100 3.566,0.12 r90 top
IC7 "M24C02-RMN6TP" SOIC127P600X175-8N 62.791,12.613 r0 top
IC8 "TCA9543APWR" SOP65P640X120-14N 33.167,3.171 r270 top
IC9 "SI5345B-D-GM" QFN50P900X900X90-65N-D 23.558,46.03 r0 top
IC10 "PE44820B-X" QFN50P500X500X90-33N-D 45.204,6.763 r180 top
J1 "2007263-1_NP" 20072631_NP 8.521,25.19 r90 bottom
J2 "SFP+" TYCO_1888247-1 26.271,32.31 r0 bottom
J3 "SFP+" TYCO_1888247-1 26.271,18.06 r0 bottom
J4 "SEAM-40-03.5-S-10-2-A-K-TR" SAMTEC_SEAM-40-03.5-S-10-2-A-K-TR 65.202,29.025 r90 bottom
J5 "SMA" SAMTEC_SMA-J-P-H-ST-MT1 11.814,6.062 r180 top
J6 "SMA" SAMTEC_SMA-J-P-H-ST-MT1 -0.461,6.062 r90 top
J7 "SMA" SAMTEC_SMA-J-P-H-ST-MT1 28.645,58.981 r90 top locked
J8 "SMA" SAMTEC_SMA-J-P-H-ST-MT1 40.92,58.981 r0 top locked
J9 "SMA" SAMTEC_SMA-J-P-H-ST-MT1 16.37,58.981 r0 top locked
J10 "SMA" SAMTEC_SMA-J-P-H-ST-MT1 53.195,58.981 r0 top locked
L1 "4.7uH" DFE322520FD1R0MP2 23.375,2.302 r90 top
L2 "4.7uH" DFE322520FD1R0MP2 15.537,33.992 r180 top
L3 "4.7uH" DFE322520FD1R0MP2 15.537,30.238 r180 top
L4 "4.7uH" DFE322520FD1R0MP2 15.537,19.74 r180 top
L5 "4.7uH" DFE322520FD1R0MP2 15.537,15.99 r180 top
LED1 "APTD1608LSECKJ3-PF" LED_APTD1608LSECKJ3-PF_KNB 6.74,32.115 r90 top
LED2 "APTD1608LSECKJ3-PF" LED_APTD1608LSECKJ3-PF_KNB 2.467,32.115 r90 top
LED3 "APTD1608LSECKJ3-PF" LED_APTD1608LSECKJ3-PF_KNB 6.74,17.865 r90 top
LED4 "APTD1608LSECKJ3-PF" LED_APTD1608LSECKJ3-PF_KNB 2.467,17.865 r90 top
Q1 "CSD15380F3" CSD15380F3 -0.438,49.604 r90 bottom
Q2 "CSD15380F3" CSD15380F3 7.513,41.298 r0 top
Q3 "CSD15380F3" CSD15380F3 4.601,58.723 r180 bottom
Q4 "CSD15380F3" CSD15380F3 1.528,44.365 r180 bottom
Q5 "CSD15380F3" CSD15380F3 6.74,30.347 r90 top
Q6 "CSD15380F3" CSD15380F3 2.467,30.347 r90 top
Q7 "CSD15380F3" CSD15380F3 6.74,16.097 r90 top
Q8 "CSD15380F3" CSD15380F3 2.467,16.097 r90 top
Q9 "48MHz" XTAL_KYOCERA_CX3225SB 14.996,46.03 r270 top
Q10 "CSD15380F3" CSD15380F3 16.821,37.281 r90 top
R1 "1M" MURATA_HI_DENSITY_0201 -1.198,51.236 r270 bottom value=100Ω
R2 "100Ω" MURATA_HI_DENSITY_0201 -0.438,50.576 r90 bottom
R3 "750" RESC1005X40N 3.382,48.426 r90 top
R4 "1M" MURATA_HI_DENSITY_0201 -0.263,48.343 r270 bottom value=100Ω
R5 "47k" RESC1005X40N -3.116,52.71 r270 top
R6 "27k" RESC1005X40N -4.326,53.18 r0 top
R7 "100k" RESC1608X55N 17.421,0.736 r90 top value=30k
R8 "750" RESC1005X40N 10.415,54.888 r90 top
R9 "150k" RESC1608X55N 18.122,-3.326 r180 top
R10 "30k" RESC1608X55N 18.122,-1.825 r180 top
R11 "47k" RESC1005X40N 3.917,59.181 r270 top
R12 "27k" RESC1005X40N 2.727,59.642 r0 top
R13 "100k" RESC1608X55N 13.081,23.622 r0 top value=30k
R14 "243k" RESC1608X55N 2.056,22.542 r90 top value=30k
R15 "750" RESC1005X40N 8.614,38.846 r270 top
R16 "100k" RESC1608X55N 3.497,22.542 r90 top value=30k
R17 "10k" MURATA_HI_DENSITY_0201 0.143,46.161 r270 top value=100Ω
R18 "200k" RESC1005X40N 6.522,41.871 r270 top
R19 "20k" RESC1005X40N -1.166,46.625 r0 top
R20 "5k1" RESC1005X40N 45.207,38.467 r0 top
R21 "1M" MURATA_HI_DENSITY_0201 2.899,57.963 r0 bottom value=100Ω
R22 "100Ω" MURATA_HI_DENSITY_0201 3.504,58.723 r180 bottom
R23 "10k" MURATA_HI_DENSITY_0201 43.676,38.467 r0 top value=100Ω
R24 "1M" MURATA_HI_DENSITY_0201 5.517,58.72 r270 bottom value=100Ω
R25 "1M" MURATA_HI_DENSITY_0201 0.171,43.33 r90 bottom value=100Ω
R26 "100Ω" MURATA_HI_DENSITY_0201 0.501,44.365 r180 bottom
R27 "1M" MURATA_HI_DENSITY_0201 4.239,42.658 r0 bottom value=100Ω
R28 "1k5" RESC1005X40N 7.21,33.819 r0 top
R29 "1k5" RESC1005X40N 2.937,33.819 r0 top
R30 "10k" MURATA_HI_DENSITY_0201 21.629,28.818 r180 top value=100Ω
R31 "10k" MURATA_HI_DENSITY_0201 21.629,29.738 r180 top value=100Ω
R32 "10k" MURATA_HI_DENSITY_0201 21.629,35.535 r180 top value=100Ω
R33 "200k" RESC1005X40N 7.035,29.287 r180 top
R34 "200k" RESC1005X40N 2.762,29.287 r180 top
R35 "10k" MURATA_HI_DENSITY_0201 21.629,34.487 r180 top value=100Ω
R36 "1k5" RESC1005X40N 7.21,19.569 r0 top
R37 "1k5" RESC1005X40N 2.937,19.569 r0 top
R38 "10k" MURATA_HI_DENSITY_0201 21.629,14.568 r180 top value=100Ω
R39 "10k" MURATA_HI_DENSITY_0201 21.652,15.488 r180 top value=100Ω
R40 "10k" MURATA_HI_DENSITY_0201 21.629,21.285 r180 top value=100Ω
R41 "200k" RESC1005X40N 7.035,15.037 r180 top
R42 "200k" RESC1005X40N 2.762,15.037 r180 top
R43 "10k" MURATA_HI_DENSITY_0201 21.629,20.237 r180 top value=100Ω
R44 "10k" MURATA_HI_DENSITY_0201 66.552,14.907 r270 top value=100Ω
R45 "10k" MURATA_HI_DENSITY_0201 68.122,13.565 r180 top value=100Ω
R46 "10k" MURATA_HI_DENSITY_0201 63.97,9.332 r180 top value=100Ω
R47 "10k" MURATA_HI_DENSITY_0201 51.009,1.241 r270 top value=100Ω
R48 "10k" MURATA_HI_DENSITY_0201 31.867,-0.592 r90 bottom value=100Ω
R49 "10k" MURATA_HI_DENSITY_0201 32.517,-0.592 r90 bottom value=100Ω
R50 "100Ω" MURATA_HI_DENSITY_0201 18.269,49.53 r90 top
R51 "100Ω" MURATA_HI_DENSITY_0201 21.058,52.277 r180 top
R52 "100Ω" MURATA_HI_DENSITY_0201 20.058,51.212 r0 top
R53 "10k" MURATA_HI_DENSITY_0201 13.768,40.543 r90 top value=100Ω
R54 "10k" MURATA_HI_DENSITY_0201 13.767,39.023 r270 top value=100Ω
R55 "22" RESC1005X40N 12.665,40.683 r270 top
R56 "22" RESC1005X40N 12.665,38.883 r90 top
R57 "750" RESC1005X40N 16.799,41.312 r90 top
R58 "200k" RESC1005X40N 15.86,37.551 r270 top
R59B "0Ω" MURATA_HI_DENSITY_0201 49.153,8.288 r90 top value=100Ω
R60B "0Ω" MURATA_HI_DENSITY_0201 41.282,8.288 r90 bottom value=100Ω
R61X "0Ω" MURATA_HI_DENSITY_0201 48.878,8.013 r0 top value=100Ω
R62X "0Ω" MURATA_HI_DENSITY_0201 41.557,8.013 r0 bottom value=100Ω
R63B "0Ω" MURATA_HI_DENSITY_0201 48.853,7.189 r90 bottom value=100Ω
R64B "0Ω" MURATA_HI_DENSITY_0201 41.282,6.639 r90 bottom value=100Ω
R65X "50Ω" MURATA_HI_DENSITY_0201 48.578,7.464 r0 bottom value=100Ω
R66X "50Ω" MURATA_HI_DENSITY_0201 41.282,6.089 r90 bottom value=100Ω
RN1 "EXB-U18103JX" EXBU18 34.167,-1.598 r180 top
RN2 "EXB-U18103JX" EXBU18 32.517,7.733 r180 top
TP1 "RCU-0C" TP+195X110 3.138,50.899 r90 top
TP2 "RCU-0C" TP+195X110 -4.349,25.19 r90 top
TP3 "RCU-0C" TP+195X110 34.776,59.332 r180 top
TP4 "RCU-0C" TP+195X110 3.24,27.547 r180 top
TP5 "RCU-0C" TP+195X110 17.696,25.19 r180 top
TP6 "RCU-0C" TP+195X110 68.378,8.07 r180 top
TP7 "RCU-0C" TP+195X110 68.378,5.53 r180 top
TP8 "RCU-0C" TP+195X110 64.85,6.794 r0 top
TP9 "RCU-0C" TP+195X110 14.073,37.285 r180 top
TP10 "RCU-0C" TP+195X110 55.372,6.453 r0 top
TP11 "RCU-0C" TP+195X110 55.372,11.557 r0 top
TP12 "RCU-0C" TP+195X110 55.372,3.901 r0 top
TP13 "RCU-0C" TP+195X110 55.372,9.005 r180 top
U1 "TPS563203DRLR" SOT_07SDRLR_TEX 20.395,-0.419 r180 top
U2 "TPSM82866AA0SRDJR" RDJ0023A-MFG 6.172,24.89 r180 top
U3 "TXB0104RUTR" RUT12_TEX 53.169,0.966 r90 top
W1 "Header 2" SAMTEC_HTSW-102-23-L-S 26.119,8.003 r0 top
W2 "Header 2" SAMTEC_HTSW-102-23-L-S 20.164,8.007 r0 top
W3 "Header 4" SAMTEC_HTSW-104-23-L-S 6.26,-0.392 r0 top
W4 "Header 3" SAMTEC_HTSW-103-23-L-S 12.348,52.063 r180 top
W5 "Header 2" SAMTEC_HTSW-102-23-L-S 9.808,48.994 r180 top
W6 "Header 2" SAMTEC_HTSW-102-23-L-S 9.808,45.925 r180 top
W7 "Header 1" SAMTEC_HTSW-101-23-L-S 9.808,42.856 r180 top

## Footprints (in the part's own frame and the unit in brackets; to place one, negate y for a bottom-side part, rotate by r counter-clockwise, add the part's x,y. Pads: shape width x height; smd on the part's side, far side on the other; paste and mask are expansions set on the pad)
20072631_NP [mm]
  rect 2x2 hole 1.05: 1(-14.25,-13.15) 2(-5.675,-13.15) 3(8.575,-13.15) 4(14.25,-8.15) 6(-14.25,-3.15) 7(-8.575,1.85) 8(-3.175,1.85) 10(5.675,1.85) 11(8.575,1.85) 12(14.25,1.85) 13(-14.25,6.85) 18(14.25,11.85) 19(14.25,21.85)
  rect 2x2 hole 0.75: 5(0,-8.07)
  rect 2x2 hole 0.95: 9(0,1.85) 14(-14.25,14.35) 15(-14.25,19.35) 16(0,11.85) 17(0,21.85)
  round 1.478 hole 0.95: 20(-14.25,9.65) 21(14.25,9.65) 22(-11.925,23.95) 23(-7.125,23.95) 24(2.325,23.95) 25(7.125,23.95)
  rect 0.5x2 smd: 26(-10.925,21.85) 27(-8.525,21.85) 28(-6.125,21.85) 29(-3.725,21.85) 30(-10.525,13.65) 31(-3.325,13.65) 32(3.325,21.85) 33(5.725,21.85) 34(8.125,21.85) 35(10.525,21.85) 36(3.725,13.65) 37(10.925,13.65)
  silkscreen extent -15.8,-24.65 15.25,24.65, body extent -15.27,-24.47 15.27,24.51, height 10.35
CAPC0510X04N [mm] "Chip Capacitor, 2-Leads, Body 0.52x1.00mm, IPC Medium Density"
  rect 0.3x1.2 smd: 1(-0.25,0) 2(0.25,0)
  body extent -0.29,-0.53 0.29,0.53, height 0.35
CAPC1005X55N [mm] "Capacitor, Non-Polarized, Chip; 1.00mm L X 0.50mm W X 0.70mm H, IPC Medium Density"
  rect 0.62x0.62 smd: 1(-0.45,0) 2(0.45,0)
  body extent -0.52,-0.27 0.53,0.28, height 0.55
CAPC1608X87N [mm] "Chip Capacitor, Body 1.6x0.8mm IPC Medium Density"
  rect 0.95x1 smd: 1(-0.8,0) 2(0.8,0)
  body extent -0.87,-0.47 0.88,0.48, height 0.87
CSD15380F3 [mm]
  rect 0.25x0.15 smd: 1(-0.2,0.175) 2(-0.2,-0.175)
  rect 0.15x0.5 smd: 3(0.2,0)
  silkscreen extent -0.26,0.5 -0.24,0.52, body extent -0.35,-0.3 0.35,0.3, height 0.45
DFE322520FD1R0MP2 [mm]
  rect 0.95x2.8 smd: 1(-1.375,0) 2(1.375,0)
  silkscreen extent 0,-1.25 0,1.25, body extent -1.6,-1.25 1.6,1.25, height 2
EXBU18 [mm]
  rect 0.175x0.3 smd: 1(-0.6,-0.275) 2(-0.2,-0.275) 3(0.2,-0.275) 4(0.6,-0.275) 5(0.6,0.275) 6(0.2,0.275) 7(-0.2,0.275) 8(-0.6,0.275)
  silkscreen extent -0.94,-0.56 -0.84,-0.46, body extent -0.71,-0.3 0.71,0.3, height 0.45
FIDUCIAL_TOP_C100-200 [mm] "Round Fiducial Target, Top Layer, 1.0mm, Top Solder 2.0mm, Keepout =2.0mm"
  round 1 smd paste-0.51 mask+0.5: FTG2(0,0)
  Top Layer keep-out circle w0.1: c0,0 r1
LED_APHHS1005LZGCK-V [mm]
  rect 0.7x0.5 smd mask+0.05: 1(-0.45,0) 2(0.45,0)
  silkscreen extent -0.66,-0.53 -0.61,-0.48, body extent -0.5,-0.25 0.5,0.25, height 0.5
LED_APTD1608LSECKJ3-PF_KNB [mm]
  rect 0.8x0.8 smd paste+0 mask+0: 1(-0.826,0) 2(0.826,0)
  silkscreen extent -1.08,-0.58 0.25,0.53, body extent -0.8,-0.41 0.8,0.41, height 0.94
LEDC1608X110N [mm]
  rect 0.9x1 smd: 1(-0.8,0) 2(0.8,0)
  silkscreen extent -1.19,-0.81 -1.09,-0.71, body extent -0.8,-0.4 0.8,0.4, height 0.95
LLL03TR61E333KE01 [mm] "Chip Capacitor, 2-Leads, Body 0.30x0.60mm, IPC High Density"
  rect 0.125x0.6 smd: 1(-0.126,0) 2(0.126,0)
  body extent -0.17,-0.32 0.17,0.32, height 0.2
MURATA_HI_DENSITY_0201 [mm]
  rect 0.3x0.274 smd: 1(-0.275,0) 2(0.275,0)
  body extent -0.32,-0.17 0.32,0.17, height 0.33
MURATA_HI_DENSITY_0402_CAP [mm]
  rect 0.4x0.65 smd: 1(-0.425,0) 2(0.425,0)
  body extent -0.53,-0.28 0.53,0.28, height 0.55
PT100 [mm]
  rect 0.55x1.65 smd: 1(-1.35,0) 2(1.35,0)
  body extent -1.6,-0.8 1.6,0.8, height 0.6
QFN50P300X300X100-17N [mm]
  rect 0.75x0.3 smd: 1(-1.5,0.75) 2(-1.5,0.25) 3(-1.5,-0.25) 4(-1.5,-0.75) 9(1.5,-0.75) 10(1.5,-0.25) 11(1.5,0.25) 12(1.5,0.75)
  rect 0.3x0.75 smd: 5(-0.75,-1.5) 6(-0.25,-1.5) 7(0.25,-1.5) 8(0.75,-1.5) 13(0.75,1.5) 14(0.25,1.5) 15(-0.25,1.5) 16(-0.75,1.5)
  rect 1.85x1.85 smd: 17(0,0)
  silkscreen extent -2,1.38 -1.75,1.62, body extent -1.55,-1.55 1.55,1.55, height 1
QFN50P500X500X90-33N-D [mm]
  rect 0.85x0.3 smd: 1(-2.45,1.75) 2(-2.45,1.25) 3(-2.45,0.75) 4(-2.45,0.25) 5(-2.45,-0.25) 6(-2.45,-0.75) 7(-2.45,-1.25) 8(-2.45,-1.75) 17(2.45,-1.75) 18(2.45,-1.25) 19(2.45,-0.75) 20(2.45,-0.25) 21(2.45,0.25) 22(2.45,0.75) 23(2.45,1.25) 24(2.45,1.75)
  rect 0.3x0.85 smd: 9(-1.75,-2.45) 10(-1.25,-2.45) 11(-0.75,-2.45) 12(-0.25,-2.45) 13(0.25,-2.45) 14(0.75,-2.45) 15(1.25,-2.45) 16(1.75,-2.45) 25(1.75,2.45) 26(1.25,2.45) 27(0.75,2.45) 28(0.25,2.45) 29(-0.25,2.45) 30(-0.75,2.45) 31(-1.25,2.45) 32(-1.75,2.45)
  rect 3.65x3.65 smd: 33(0,0)
  silkscreen extent -3,2.38 -2.75,2.62, body extent -2.55,-2.55 2.55,2.55, height 0.9
QFN50P900X900X90-65N-D [mm]
  rect 0.85x0.3 smd: 1(-4.45,3.75) 2(-4.45,3.25) 3(-4.45,2.75) 4(-4.45,2.25) 5(-4.45,1.75) 6(-4.45,1.25) 7(-4.45,0.75) 8(-4.45,0.25) 9(-4.45,-0.25) 10(-4.45,-0.75) 11(-4.45,-1.25) 12(-4.45,-1.75) 13(-4.45,-2.25) 14(-4.45,-2.75) 15(-4.45,-3.25) 16(-4.45,-3.75) 33(4.45,-3.75) 34(4.45,-3.25) 35(4.45,-2.75) 36(4.45,-2.25) 37(4.45,-1.75) 38(4.45,-1.25) 39(4.45,-0.75) 40(4.45,-0.25) 41(4.45,0.25) 42(4.45,0.75) 43(4.45,1.25) 44(4.45,1.75) 45(4.45,2.25) 46(4.45,2.75) 47(4.45,3.25) 48(4.45,3.75)
  rect 0.3x0.85 smd: 17(-3.75,-4.45) 18(-3.25,-4.45) 19(-2.75,-4.45) 20(-2.25,-4.45) 21(-1.75,-4.45) 22(-1.25,-4.45) 23(-0.75,-4.45) 24(-0.25,-4.45) 25(0.25,-4.45) 26(0.75,-4.45) 27(1.25,-4.45) 28(1.75,-4.45) 29(2.25,-4.45) 30(2.75,-4.45) 31(3.25,-4.45) 32(3.75,-4.45) 49(3.75,4.45) 50(3.25,4.45) 51(2.75,4.45) 52(2.25,4.45) 53(1.75,4.45) 54(1.25,4.45) 55(0.75,4.45) 56(0.25,4.45) 57(-0.25,4.45) 58(-0.75,4.45) 59(-1.25,4.45) 60(-1.75,4.45) 61(-2.25,4.45) 62(-2.75,4.45) 63(-3.25,4.45) 64(-3.75,4.45)
  rect 5.3x5.3 smd: 65(0,0)
  silkscreen extent -5,4.38 -4.75,4.62, body extent -4.55,-4.55 4.55,4.55, height 0.9
RDJ0023A-MFG [mm]
  round 0.45 smd paste+0 mask+0: 1(-1.375,1.625) 7(-1.375,-1.625) 12(1.375,-1.625) 18(1.375,1.625)
  rect 0.7x0.25 smd paste+0 mask+0: 2(-1.575,1) 3(-1.575,0.5) 4(-1.575,0) 5(-1.575,-0.5) 6(-1.575,-1) 13(1.575,-1) 14(1.575,-0.5) 15(1.575,0) 16(1.575,0.5) 17(1.575,1)
  rect 0.25x0.7 smd paste+0 mask+0: 8(-0.75,-1.825) 9(-0.25,-1.825) 10(0.25,-1.825) 11(0.75,-1.825) 19(0.75,1.825) 20(0.25,1.825) 21(-0.25,1.825) 22(-0.75,1.825)
  rect 1.6x1.8 smd paste-0.887 mask+0: 23(0,-0.3)
  Top Layer region: -1.925,1.425 -1.925,1.575 -1.875,1.625 -1.675,1.625 -1.625,1.675 -1.625,1.825 -1.575,1.875 -1.425,1.875 -1.375,1.925 -1.375,2.125 -1.325,2.175 -1.175,2.175 -1.125,2.125 -1.125,1.425 -1.175,1.375 -1.875,1.375
  Top Layer region: -1.925,-1.425 -1.925,-1.575 -1.875,-1.625 -1.675,-1.625 -1.625,-1.675 -1.625,-1.825 -1.575,-1.875 -1.425,-1.875 -1.375,-1.925 -1.375,-2.125 -1.325,-2.175 -1.175,-2.175 -1.125,-2.125 -1.125,-1.425 -1.175,-1.375 -1.875,-1.375
  Top Layer region: 1.925,-1.425 1.925,-1.575 1.875,-1.625 1.675,-1.625 1.625,-1.675 1.625,-1.825 1.575,-1.875 1.425,-1.875 1.375,-1.925 1.375,-2.125 1.325,-2.175 1.175,-2.175 1.125,-2.125 1.125,-1.425 1.175,-1.375 1.875,-1.375
  Top Layer region: 1.925,1.425 1.925,1.575 1.875,1.625 1.675,1.625 1.625,1.675 1.625,1.825 1.575,1.875 1.425,1.875 1.375,1.925 1.375,2.125 1.325,2.175 1.175,2.175 1.125,2.125 1.125,1.425 1.175,1.375 1.875,1.375
  silkscreen extent -2.28,1.91 -2.03,2.16, body extent -1.75,-2 1.75,2, height 1.45
RESC1005X40N [mm] "Chip Resistor, EIA 0402, Metric 1005, Body 1.0x0.5mm, IPC Medium Density"
  rect 0.58x0.62 smd: 1(-0.47,0) 2(0.47,0)
  body extent -0.52,-0.27 0.53,0.28, height 0.4
RESC1608X55N [mm] "Chip Resistor, EIA 0603, Metric 1608, Body 1.6x0.8mm, IPC Medium Density"
  rect 0.9x1 smd: 1(-0.8,0) 2(0.8,0)
  body extent -0.87,-0.47 0.88,0.48, height 0.55
RUT12_TEX [mm]
  rect 0.6x0.2 smd paste+0 mask+0.05: 1(-0.7,0.8) 2(-0.7,0.4) 3(-0.7,0) 4(-0.7,-0.4) 5(-0.7,-0.8) 7(0.7,-0.8) 8(0.7,-0.4) 9(0.7,0) 10(0.7,0.4) 11(0.7,0.8)
  rect 0.2x0.6 smd paste+0 mask+0.05: 6(0,-0.8) 12(0,0.8)
  silkscreen extent -1.32,1.14 -1.12,1.34, body extent -0.95,-1.1 0.95,1.1, height 0.6
SAMTEC_HTSW-101-23-L-S [mm] "Single Contact Through Mount Straigh Header (Post Lead 5.84mm, Tail Lead 2.92mm, Insulator 2.54mm)"
  round 1.7 hole 1: 1(0,0)
  silkscreen extent -1.27,-1.27 1.27,1.27, body extent -1.27,-1.27 1.27,1.27, height 8.38
SAMTEC_HTSW-102-23-L-S [mm] "2 Contacts - Pitch 2.54mm - Single Row  Through Mount Straigh Header (Post Lead 5.84mm, Tail Lead 2.92mm, Insulator 2.54mm)"
  rect 1.7x1.7 hole 1: 1(0,0)
  round 1.7 hole 1: 2(2.54,0)
  silkscreen extent -1.27,-1.27 3.81,2.05, body extent -1.27,-1.27 3.81,1.27, height 8.38
SAMTEC_HTSW-103-23-L-S [mm] "3 Contacts - Pitch 2.54mm - Single Row  Through Mount Straigh Header (Post Lead 5.84mm, Tail Lead 2.92mm, Insulator 2.54mm)"
  rect 1.7x1.7 hole 1: 1(0,0)
  round 1.7 hole 1: 2(2.54,0) 3(5.08,0)
  silkscreen extent -1.27,-1.27 6.35,1.93, body extent -1.27,-1.27 6.35,1.27, height 8.38
SAMTEC_HTSW-104-23-L-S [mm] "4 Contacts - Pitch 2.54mm - Single Row Through Mount Straigh Header (Post Lead 5.84mm, Tail Lead 2.92mm, Insulator 2.54mm)"
  rect 1.7x1.7 hole 1: 1(0,0)
  round 1.7 hole 1: 2(2.54,0) 3(5.08,0) 4(7.62,0)
  silkscreen extent -1.27,-1.27 8.89,1.93, body extent -1.27,-1.27 8.89,1.27, height 8.38